# EAGLE board MeadowF7MicroDebug_REVA (EAGLE 9.2.1), part 1 of 2
uMeadow eval Kit.
DATE: 09/16/2018; ENGINEER: S.JOHNSON; PART_NUMBER: uMeadow; REV: A
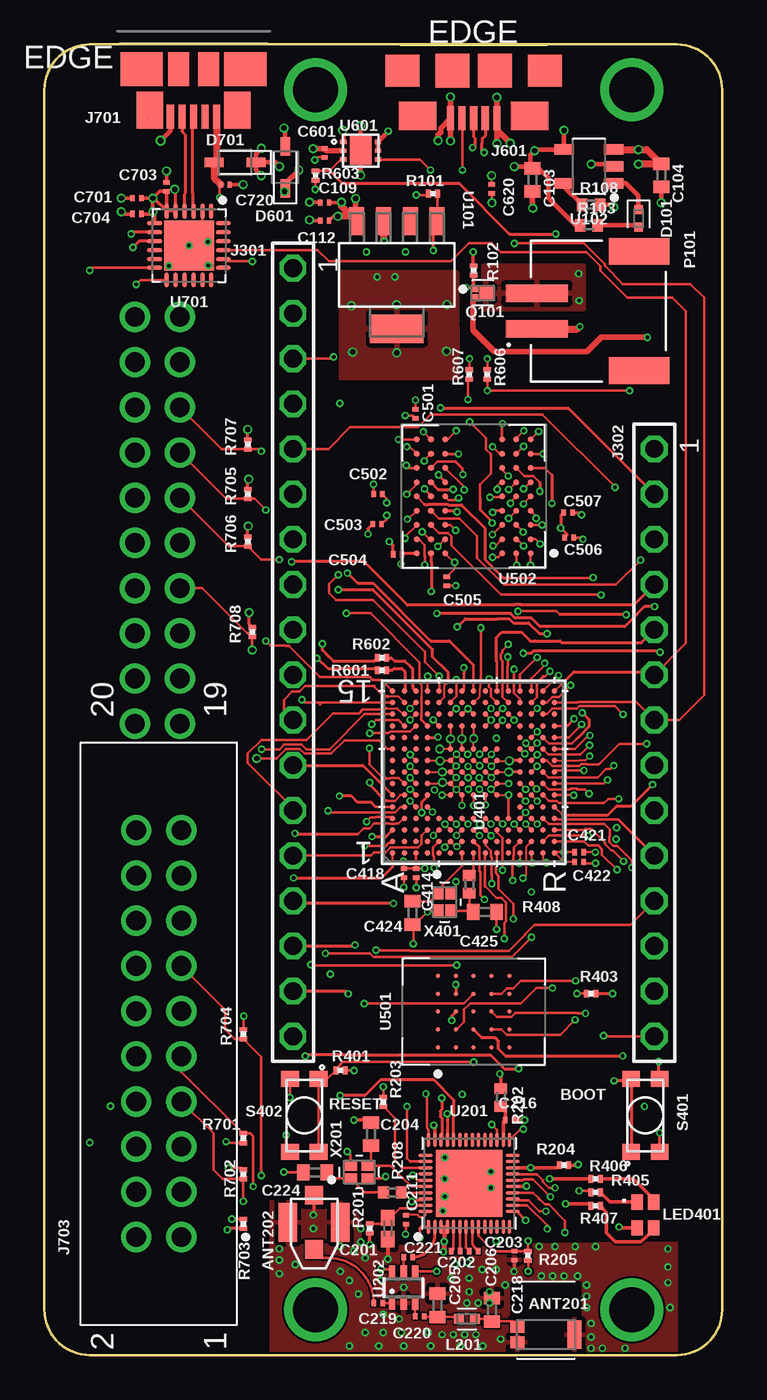
[diagram p0: board, top side]
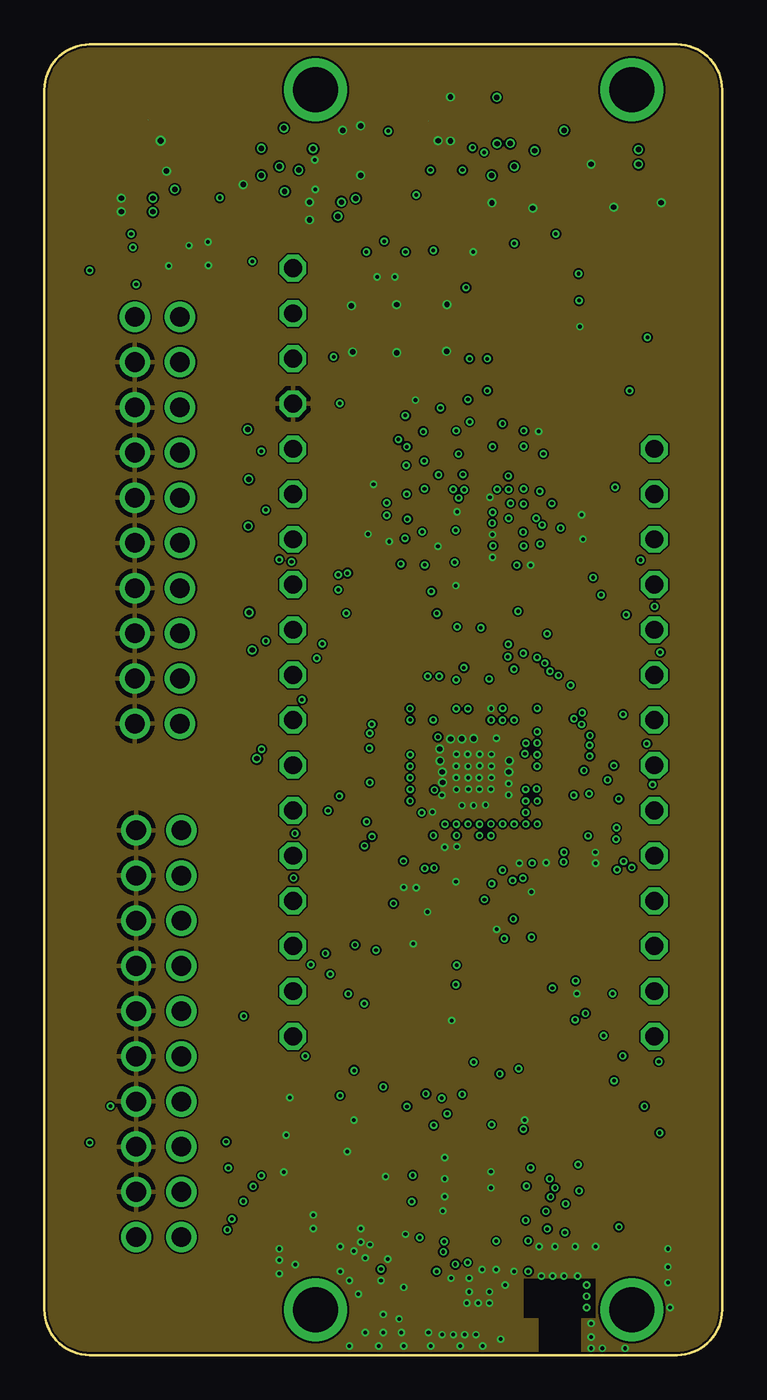
[diagram p1: board, inner layer Route2]
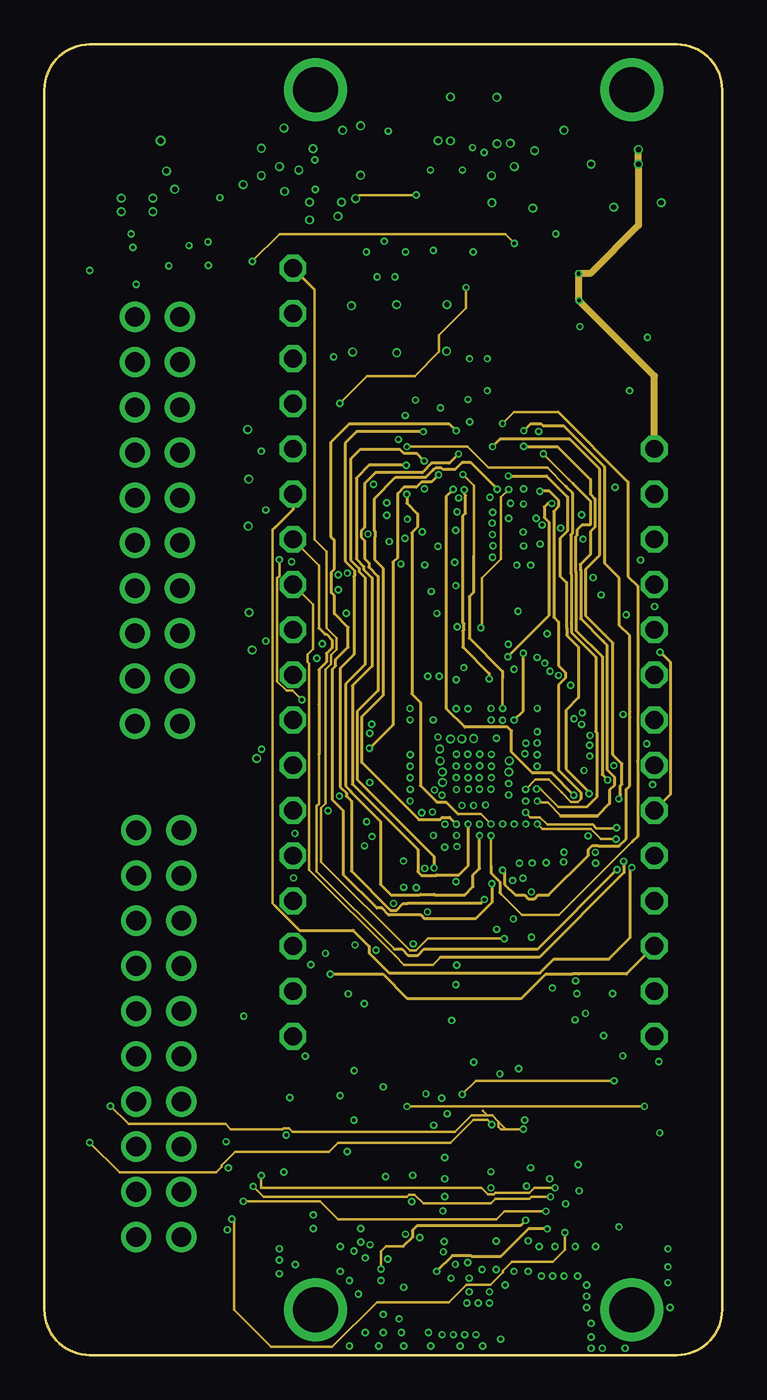
[diagram p2: board, inner layer Route3]
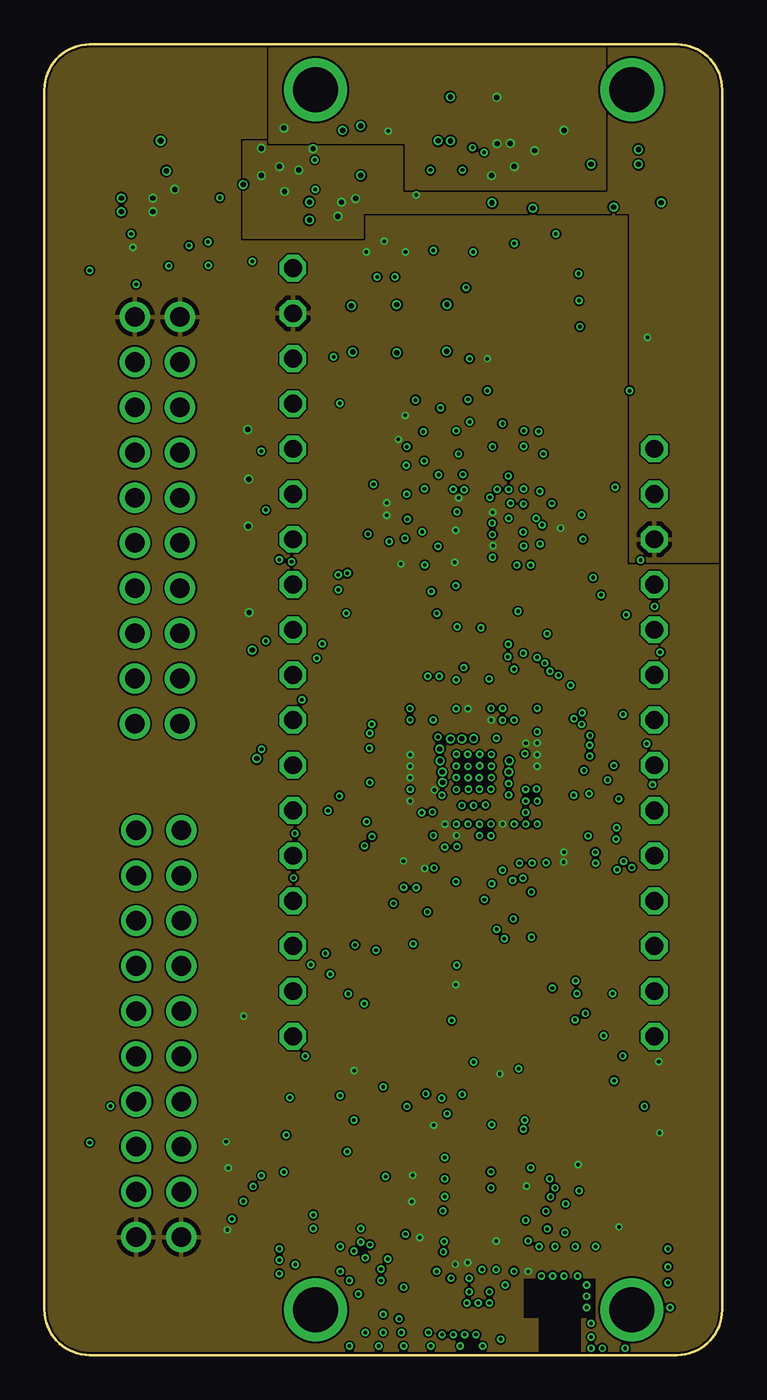
[diagram p3: board, inner layer Route14]
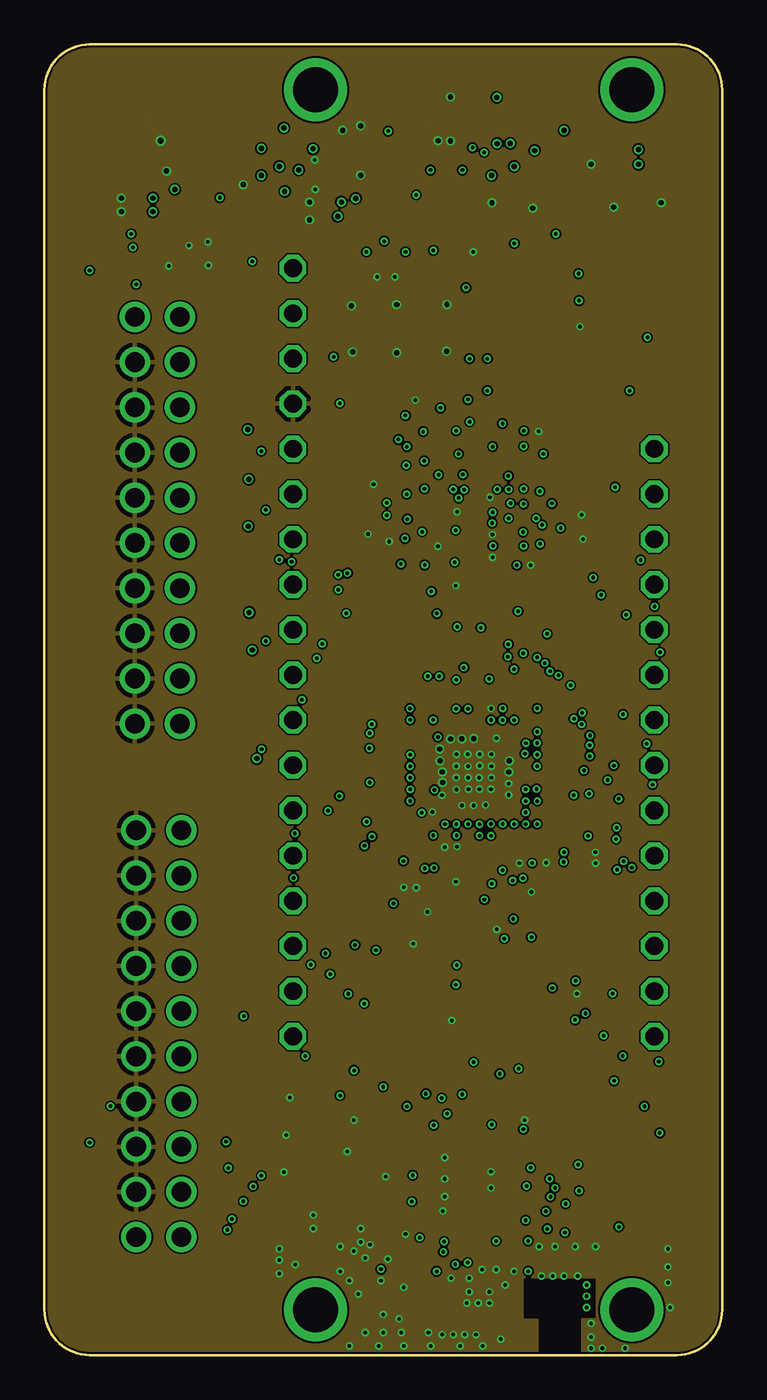
[diagram p4: board, inner layer Route15]
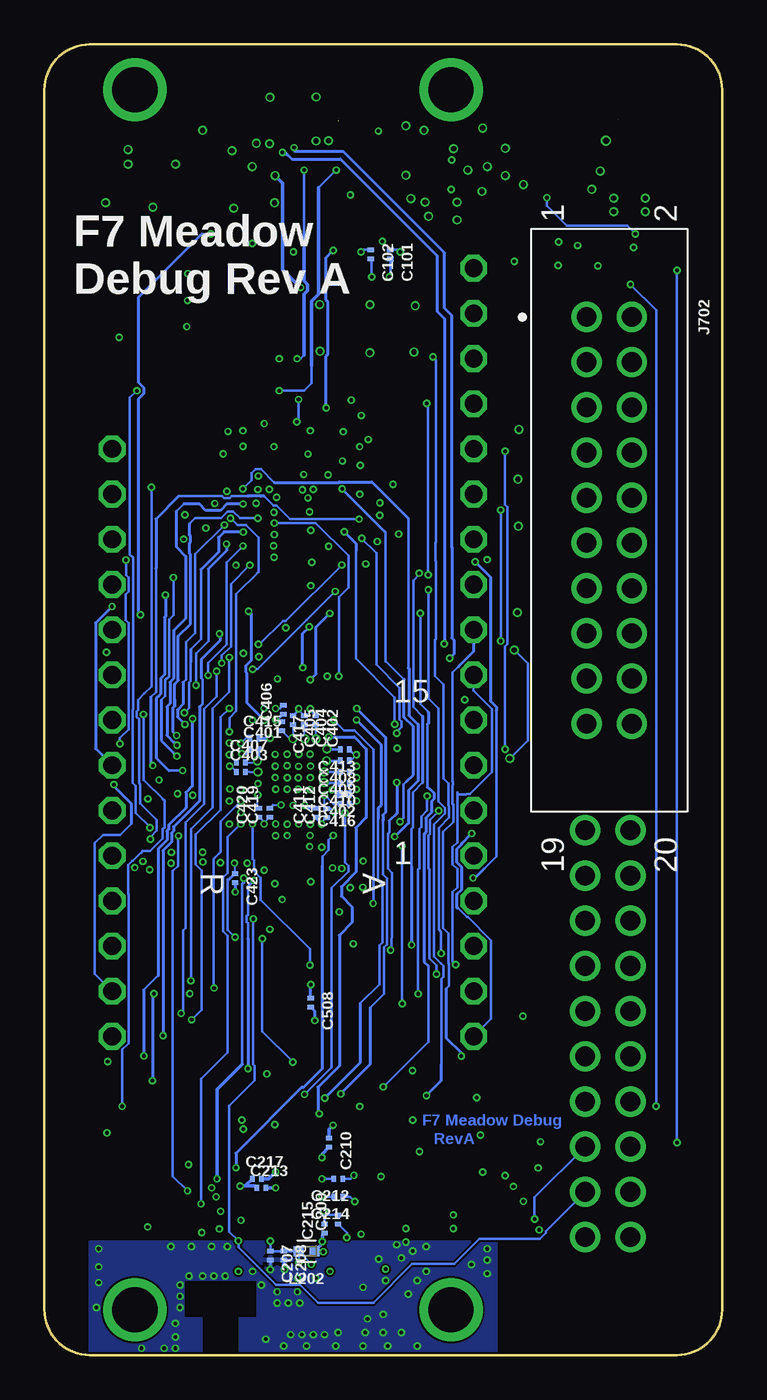
[diagram p5: board, bottom side, seen from below]

Size 38.1 x 73.66 mm. Coordinates in mm from the lower left corner, seen from the top.
Outline: 0,71.12 0,2.54 arc90 2.54,0 35.56,0 arc90 38.1,2.54 38.1,71.12 arc90 35.56,73.66 2.54,73.66 arc90 0,71.12
Copper layers (1*2+3*14+15*16): Top 0.035mm / dielectric 0.15mm / Route2 0.035mm / dielectric 0.15mm / Route3 0.035mm / dielectric 0.3mm / Route14 0.035mm / dielectric 0.15mm / Route15 0.035mm / dielectric 0.15mm / Bottom 0.035mm
Design rules "default *": minimum track width 0.1mm, minimum drill 0.15mm, track to track 0.1mm, track to pad 0.1mm, pad to pad 4mil, via to via 4mil, smd to smd 0mil, copper to edge 0.1mm, drill to drill 6mil, minimum pad ring 0.1mm, minimum via ring 4mil, stop-mask expansion 1mil, vias tented up to drill 20mil, thermal gap 10mil
Net classes: 1 USB: width 0.165 mm, drill 0.102 mm, clearance 0.254 mm; 2 MEM_ADDR_CNT: width 0.102 mm, drill 0.102 mm; 3 MEM_DATA: width 0.102 mm; 4 5V: width 0.1 mm; 5 50ohm: width 0.1 mm; 6 POWER: width 0.1 mm, drill 0.203 mm; 7 CLK: width 0.1 mm, drill 0.203 mm; 8 ANT: clearance 0.3 mm

## Footprints (pad centres in the part's own frame; a part is rotated, then mirrored left to right if it is on the bottom)
W3008 = smd 0.8 x 0.65: 1 1.6,-0.425; 2 1.6,0.425 | smd 0.8 x 1.6: 3 -1.6,0
A-1JB = smd 2.2 x 1.05: GND 0,1.475; GND2 0,-1.475 | smd 1.05 x 1: GND1 -1.525,0; SIG 1.525,0
C0201 = smd 0.25 x 0.35: 1 -0.25,0; 2 0.25,0
C0402 = smd 0.7 x 0.9: 1 -0.65,0; 2 0.65,0
C0402K = smd 0.925 x 0.74: 1 -0.6,0; 2 0.6,0
LEDC1005X50 = smd 0.5 x 0.5: 1 -0.5,0; 2 0.5,0
SOD2512X117 = smd 1.054 x 0.53: 1 -1.181,0; 2 1.181,0
TSW-118-XX-G-S = drill 1 pad 1.5 octagon: 1 21.59,0; 2 19.05,0; 3 16.51,0; 4 13.97,0; 5 11.43,0; 6 8.89,0; 7 6.35,0; 8 3.81,0; 9 1.27,0; 10 -1.27,0; 11 -3.81,0; 12 -6.35,0; 13 -8.89,0; 14 -11.43,0; 15 -13.97,0; 16 -16.51,0; 17 -19.05,0; 18 -21.59,0
TSW-114-XX-G-S = drill 1 pad 1.5 octagon: 1 16.51,0; 2 13.97,0; 3 11.43,0; 4 8.89,0; 5 6.35,0; 6 3.81,0; 7 1.27,0; 8 -1.27,0; 9 -3.81,0; 10 -6.35,0; 11 -8.89,0; 12 -11.43,0; 13 -13.97,0; 14 -16.51,0
USB_OTG = smd 0.4 x 1.35: 1 -1.3,2.675; 2 -0.65,2.675; 3 0,2.675; 4 0.65,2.675; 5 1.3,2.675 | smd 2.1 x 1.6: SHD1 3.15,2.55; SHD2 -3.15,2.55 | smd 1.9 x 1.9: SHD3 1.2,0; SHD4 -1.2,0 | smd 1.9 x 1.8: SHD5 -4,0; SHD6 4,0
USB_473461001 = smd 0.4 x 1.35: 1 -1.3,2.675; 2 -0.65,2.675; 3 0,2.675; 4 0.65,2.675; 5 1.3,2.675 | smd 1.5 x 2.1: SHD1 2.462,2.3; SHD2 -2.462,2.3 | smd 1.175 x 1.9: SHD3 0.838,0; SHD4 -0.838,0 | smd 2.375 x 1.9: SHD5 -2.913,0; SHD6 2.913,0
HDRV20W64P254_2X10_3276X876X838B = drill 1.105 pad 1.705: 1 0,0; 2 0,2.54; 3 2.54,0; 4 2.54,2.54; 5 5.08,0; 6 5.08,2.54; 7 7.62,0; 8 7.62,2.54; 9 10.16,0; 10 10.16,2.54; 11 12.7,0; 12 12.7,2.54; 13 15.24,0; 14 15.24,2.54; 15 17.78,0; 16 17.78,2.54; 17 20.32,0; 18 20.32,2.54; 19 22.86,0; 20 22.86,2.54
L0402 = smd 0.556 x 0.559: 1 -0.452,0; 2 0.452,0
LTST-C19HE1WT = smd 0.65 x 0.85: 1 -0.475,0.725; 2 0.475,0.725; 3 0.475,-0.725; 4 -0.475,-0.725
MTH_100_140MIL = drill 2.54 pad 3.556: P$1 0,0
JST_S2B-PH-SM4-TB(LF)(SN) = smd 1 x 3.5: 1 1,0; 2 -1,0 | smd 1.5 x 3.4: P1 3.35,5.75; P2 -3.35,5.75
DFN120X80X50-3 = smd 0.36 x 0.35: 1 -0.42,0.225; 2 -0.42,-0.225 | smd 0.76 x 0.772: 3 0.195,0
R0201 = smd 0.28 x 0.43: 1 -0.255,0; 2 0.255,0
R0402 = smd 0.6 x 0.7: 1 -0.5,0; 2 0.5,0
KMR211NG = smd 0.9 x 1: 1 -2.05,0.8; 2 2.05,0.8; 3 2.05,-0.8; 4 -2.05,-0.8
SOT150P696X180-5N = smd 1.6 x 0.838: 1 -3.023,2.261; 2 -3.023,0.762; 3 -3.023,-0.762; 4 -3.023,-2.261 | smd 1.6 x 2.997: 5 3.023,0
SOT95P270X145-5 = smd 1.1 x 0.6: 1 -1.4,0.95; 2 -1.4,0; 3 -1.4,-0.95; 4 1.4,-0.95; 5 1.4,0.95
QFN35P500X500X90-49N = smd 0.81 x 0.2: 1 -2.445,2.275; 2 -2.445,1.925; 3 -2.445,1.575; 4 -2.445,1.225; 5 -2.445,0.875; 6 -2.445,0.525; 7 -2.445,0.175; 8 -2.445,-0.175; 9 -2.445,-0.525; 10 -2.445,-0.875; 11 -2.445,-1.225; 12 -2.445,-1.575; 13 -2.445,-1.925; 14 -2.445,-2.275; 25 2.445,-2.275; 26 2.445,-1.925; 27 2.445,-1.575; 28 2.445,-1.225; 29 2.445,-0.875; 30 2.445,-0.525; 31 2.445,-0.175; 32 2.445,0.175; 33 2.445,0.525; 34 2.445,0.875; 35 2.445,1.225; 36 2.445,1.575; 37 2.445,1.925; 38 2.445,2.275 | smd 0.2 x 0.81: 15 -1.575,-2.445; 16 -1.225,-2.445; 17 -0.875,-2.445; 18 -0.525,-2.445; 19 -0.175,-2.445; 20 0.175,-2.445; 21 0.525,-2.445; 22 0.875,-2.445; 23 1.225,-2.445; 24 1.575,-2.445; 39 1.575,2.445; 40 1.225,2.445; 41 0.875,2.445; 42 0.525,2.445; 43 0.175,2.445; 44 -0.175,2.445; 45 -0.525,2.445; 46 -0.875,2.445; 47 -1.225,2.445; 48 -1.575,2.445 | smd 3.75 x 3.75: 49 0,0
SC70-6L = smd 0.35 x 0.8: 1 -0.65,-0.85; 2 0,-0.85; 3 0.65,-0.85; 4 0.65,0.85; 5 0,0.85; 6 -0.65,0.85
UFBGA-176 = smd 0.3 x 0.3: A1 -4.55,4.55; A2 -3.9,4.55; A3 -3.25,4.55; A4 -2.6,4.55; A5 -1.95,4.55; A6 -1.3,4.55; A7 -0.65,4.55; A8 0,4.55; A9 0.65,4.55; A10 1.3,4.55; A11 1.95,4.55; A12 2.6,4.55; A13 3.25,4.55; A14 3.9,4.55; A15 4.55,4.55; B1 -4.55,3.9; B2 -3.9,3.9; B3 -3.25,3.9; B4 -2.6,3.9; B5 -1.95,3.9; B6 -1.3,3.9; B7 -0.65,3.9; B8 0,3.9; B9 0.65,3.9; B10 1.3,3.9; B11 1.95,3.9; B12 2.6,3.9; B13 3.25,3.9; B14 3.9,3.9; B15 4.55,3.9; C1 -4.55,3.25; C2 -3.9,3.25; C3 -3.25,3.25; C4 -2.6,3.25; C5 -1.95,3.25; C6 -1.3,3.25; C7 -0.65,3.25; C8 0,3.25; C9 0.65,3.25; C10 1.3,3.25; C11 1.95,3.25; C12 2.6,3.25; C13 3.25,3.25; C14 3.9,3.25; C15 4.55,3.25; D1 -4.55,2.6; D2 -3.9,2.6; D3 -3.25,2.6; D4 -2.6,2.6; D5 -1.95,2.6; D6 -1.3,2.6; D7 -0.65,2.6; D8 0,2.6; D9 0.65,2.6; D10 1.3,2.6; D11 1.95,2.6; D12 2.6,2.6; D13 3.25,2.6; D14 3.9,2.6; D15 4.55,2.6; E1 -4.55,1.95; E2 -3.9,1.95; E3 -3.25,1.95; E4 -2.6,1.95; E12 2.6,1.95; E13 3.25,1.95; E14 3.9,1.95; E15 4.55,1.95; F1 -4.55,1.3; F2 -3.9,1.3; F3 -3.25,1.3; F4 -2.6,1.3; F6 -1.3,1.3; F7 -0.65,1.3; F8 0,1.3; F9 0.65,1.3; F10 1.3,1.3; F12 2.6,1.3; F13 3.25,1.3; F14 3.9,1.3; F15 4.55,1.3; G1 -4.55,0.65; G2 -3.9,0.65; G3 -3.25,0.65; G4 -2.6,0.65; G6 -1.3,0.65; G7 -0.65,0.65; G8 0,0.65; G9 0.65,0.65; G10 1.3,0.65; G12 2.6,0.65; G13 3.25,0.65; G14 3.9,0.65; G15 4.55,0.65; H1 -4.55,0; H2 -3.9,0; H3 -3.25,0; H4 -2.6,0; H6 -1.3,0; H7 -0.65,0; H8 0,0; H9 0.65,0; H10 1.3,0; H12 2.6,0; H13 3.25,0; H14 3.9,0; H15 4.55,0; J1 -4.55,-0.65; J2 -3.9,-0.65; J3 -3.25,-0.65; J4 -2.6,-0.65; J6 -1.3,-0.65; J7 -0.65,-0.65; J8 0,-0.65; J9 0.65,-0.65; J10 1.3,-0.65; J12 2.6,-0.65; J13 3.25,-0.65; J14 3.9,-0.65; J15 4.55,-0.65; K1 -4.55,-1.3; K2 -3.9,-1.3; K3 -3.25,-1.3; K4 -2.6,-1.3; K6 -1.3,-1.3; K7 -0.65,-1.3; K8 0,-1.3; K9 0.65,-1.3; K10 1.3,-1.3; K12 2.6,-1.3; K13 3.25,-1.3; K14 3.9,-1.3; K15 4.55,-1.3; L1 -4.55,-1.95; L2 -3.9,-1.95; L3 -3.25,-1.95; L4 -2.6,-1.95; L12 2.6,-1.95; L13 3.25,-1.95; L14 3.9,-1.95; L15 4.55,-1.95; M1 -4.55,-2.6; M2 -3.9,-2.6; M3 -3.25,-2.6; M4 -2.6,-2.6; M5 -1.95,-2.6; M6 -1.3,-2.6; M7 -0.65,-2.6; M8 0,-2.6; M9 0.65,-2.6; M10 1.3,-2.6; M11 1.95,-2.6; M12 2.6,-2.6; M13 3.25,-2.6; M14 3.9,-2.6; M15 4.55,-2.6; N1 -4.55,-3.25; N2 -3.9,-3.25; N3 -3.25,-3.25; N4 -2.6,-3.25; N5 -1.95,-3.25; N6 -1.3,-3.25; N7 -0.65,-3.25; N8 0,-3.25; N9 0.65,-3.25; N10 1.3,-3.25; N11 1.95,-3.25; N12 2.6,-3.25; N13 3.25,-3.25; N14 3.9,-3.25; N15 4.55,-3.25; P1 -4.55,-3.9; P2 -3.9,-3.9; P3 -3.25,-3.9; P4 -2.6,-3.9; P5 -1.95,-3.9; P6 -1.3,-3.9; P7 -0.65,-3.9; P8 0,-3.9; P9 0.65,-3.9; P10 1.3,-3.9; P11 1.95,-3.9; P12 2.6,-3.9; P13 3.25,-3.9; P14 3.9,-3.9; P15 4.55,-3.9; R1 -4.55,-4.55; R2 -3.9,-4.55; R3 -3.25,-4.55; R4 -2.6,-4.55; R5 -1.95,-4.55; R6 -1.3,-4.55; R7 -0.65,-4.55; R8 0,-4.55; R9 0.65,-4.55; R10 1.3,-4.55; R11 1.95,-4.55; R12 2.6,-4.55; R13 3.25,-4.55; R14 3.9,-4.55; R15 4.55,-4.55
BGA25C100P5X5_800X600X120 = smd 0.25 x 0.25: A1 -2,2; A2 -1,2; A3 0,2; A4 1,2; A5 2,2; B1 -2,1; B2 -1,1; B3 0,1; B4 1,1; B5 2,1; C1 -2,0; C2 -1,0; C3 0,0; C4 1,0; C5 2,0; D1 -2,-1; D2 -1,-1; D3 0,-1; D4 1,-1; D5 2,-1; E1 -2,-2; E2 -1,-2; E3 0,-2; E4 1,-2; E5 2,-2
BGA81C80P9X9_800X800X120 = smd 0.35 x 0.35: A1 -3.2,3.2; A2 -2.4,3.2; A3 -1.6,3.2; A7 1.6,3.2; A8 2.4,3.2; A9 3.2,3.2; B1 -3.2,2.4; B2 -2.4,2.4; B3 -1.6,2.4; B7 1.6,2.4; B8 2.4,2.4; B9 3.2,2.4; C1 -3.2,1.6; C2 -2.4,1.6; C3 -1.6,1.6; C7 1.6,1.6; C8 2.4,1.6; C9 3.2,1.6; D1 -3.2,0.8; D2 -2.4,0.8; D3 -1.6,0.8; D7 1.6,0.8; D8 2.4,0.8; D9 3.2,0.8; E1 -3.2,0; E2 -2.4,0; E3 -1.6,0; E7 1.6,0; E8 2.4,0; E9 3.2,0; F1 -3.2,-0.8; F2 -2.4,-0.8; F3 -1.6,-0.8; F7 1.6,-0.8; F8 2.4,-0.8; F9 3.2,-0.8; G1 -3.2,-1.6; G2 -2.4,-1.6; G3 -1.6,-1.6; G7 1.6,-1.6; G8 2.4,-1.6; G9 3.2,-1.6; H1 -3.2,-2.4; H2 -2.4,-2.4; H3 -1.6,-2.4; H7 1.6,-2.4; H8 2.4,-2.4; H9 3.2,-2.4; J1 -3.2,-3.2; J2 -2.4,-3.2; J3 -1.6,-3.2; J7 1.6,-3.2; J8 2.4,-3.2; J9 3.2,-3.2
U-DFN2018-6 = smd 0.35 x 0.25: 1 -0.975,0.5; 2 -0.975,0; 3 -0.975,-0.5; 4 0.975,-0.5; 5 0.975,0; 6 0.975,0.5 | smd 1.2 x 1.6: TAB 0,0
QFN50P400X400X80-25T280 = smd 0.86 x 0.264: 1 -1.935,1.25; 2 -1.935,0.75; 3 -1.935,0.25; 4 -1.935,-0.25; 5 -1.935,-0.75; 6 -1.935,-1.25; 13 1.935,-1.25; 14 1.935,-0.75; 15 1.935,-0.25; 16 1.935,0.25; 17 1.935,0.75; 18 1.935,1.25 | smd 0.264 x 0.86: 7 -1.25,-1.935; 8 -0.75,-1.935; 9 -0.25,-1.935; 10 0.25,-1.935; 11 0.75,-1.935; 12 1.25,-1.935; 19 1.25,1.935; 20 0.75,1.935; 21 0.25,1.935; 22 -0.25,1.935; 23 -0.75,1.935; 24 -1.25,1.935 | smd 2.8 x 2.8: 25 0,0
OSCCC160X120X40 = smd 0.73 x 0.58: 1 -0.5,-0.35; 2 0.5,-0.35; 3 0.5,0.35; 4 -0.5,0.35

## Placement (x,y rotation side)
ANT201  w3008  [W3008]  28.19,1.14 180 top
ANT202  A-1JB  [A-1JB]  15.16,7.47 270 top
C101  0.1uF  [C0201]  18.66,61.87 270 bottom
C102  1uF  [C0201]  19.75,61.87 270 bottom
C103  4.7uF  [C0402]  27.43,66.04 270 top
C104  4.7uF  [C0402]  34.67,66.29 270 top
C109  0.1uF  [C0201]  15.75,64.77 180 top
C112  1uF  [C0201]  15.75,63.75 180 top
C201  3nF  [C0402K]  19.3,7.11 90 top
C202  0.1uF  [C0201]  23.11,5.84 0 top
C203  0.1uF  [C0201]  24.13,5.84 0 top
C204  8pF  [C0402]  18.35,12.43 90 top
C205  6pF  [C0402]  22.1,2.79 90 top
C206  6.2pF  [C0402]  25.15,2.54 90 top
C207  0.1uF  [C0201]  25.4,5.59 270 bottom
C208  1uF  [C0201]  24.64,5.59 270 bottom
C209  0.1uF  [C0201]  21.59,7.62 90 bottom
C210  1uF  [C0201]  22.1,11.94 270 bottom
C211  10nF  [C0201]  20.32,7.62 90 top
C212  1uF  [C0201]  21.59,9.91 180 bottom
C213  0.1uF  [C0201]  25.91,9.4 0 bottom
C214  0.1uF  [C0201]  21.59,8.89 180 bottom
C215  0.1uF  [C0201]  22.35,7.11 90 bottom
C216  0.1uF  [C0201]  26.16,13.21 0 top
C217  100pF  [C0201]  26.16,9.91 0 bottom
C218  0.1uF  [C0201]  26.42,5.59 270 top
C219  100pF  [C0201]  18.77,2.92 0 top
C220  100pF  [C0201]  21.11,2.18 180 top
C221  100pF  [C0201]  20.45,5.51 0 top
C224  8pF  [C0402]  15.21,10.28 180 top
C401  2.2uF  [C0201]  26.29,34.04 0 bottom
C402  2.2uF  [C0201]  22.86,35.69 270 bottom
C403  0.1uF  [C0201]  27.05,32.77 0 bottom
C404  1uF  [C0201]  23.49,35.69 270 bottom
C405  0.1uF  [C0201]  24.12,35.68 270 bottom
C406  0.1uF  [C0201]  24.67,36.27 90 bottom
C407  0.1uF  [C0201]  27.05,33.31 0 bottom
C408  0.1uF  [C0201]  21.21,33.4 180 bottom
C409  0.1uF  [C0201]  21.21,32.77 180 bottom
C410  0.1uF  [C0201]  21.21,32.13 180 bottom
C411  0.1uF  [C0201]  22.83,30.49 90 bottom
C412  0.1uF  [C0201]  22.23,30.46 90 bottom
C413  0.1uF  [C0201]  21.21,34.04 180 bottom
C414  0.1uF  [C0201]  20.9,27.09 270 top
C415  0.1uF  [C0201]  26.29,34.67 0 bottom
C416  0.1uF  [C0201]  21.22,30.97 180 bottom
C417  0.1uF  [C0201]  24.76,35.34 270 bottom
C418  0.1uF  [C0201]  20.21,27.09 270 top
C419  1uF  [C0201]  25.43,30.49 90 bottom
C420  0.1uF  [C0201]  26.04,30.48 90 bottom
C421  0.1uF  [C0201]  30.05,28.26 0 top
C422  1uF  [C0201]  30.05,27.72 0 top
C423  0.1uF  [C0201]  27.38,26.79 270 bottom
C424  8pF  [C0402]  20.7,24.85 270 top
C425  8pF  [C0402]  24.77,24.89 0 top
C501  0.1uF  [C0201]  20.86,52.91 90 top
C502  0.1uF  [C0201]  18.75,48.39 180 top
C503  0.1uF  [C0201]  18.7,46.7 180 top
C504  1uF  [C0201]  19.85,45 180 top
C505  0.1uF  [C0201]  22.62,43.49 270 top
C506  1uF  [C0201]  29.49,45.94 0 top
C507  0.1uF  [C0201]  29.44,47.35 0 top
C508  0.1uF  [C0201]  23.13,19.8 270 bottom
C601  0.1uF  [C0201]  15.75,67.56 270 top
C620  4.7uF  [C0201]  25.15,65.53 270 top
C701  0.1uF  [C0201]  5.21,65.02 180 top
C703  0.1uF  [C0201]  6.86,65.66 90 top
C704  1uF  [C0201]  5.21,64.14 180 top
C720  4.7uF  [C0201]  10.16,65.79 0 top
D101  QBLP595-O  [LEDC1005X50]  33.4,63.88 270 top
D601  BAT60JFILM  [SOD2512X117]  13.53,66.75 90 top
D701  BAT60JFILM  [SOD2512X117]  10.72,67.03 180 top
DRILEGEND  [DRILEGEND]  -105.34,-61.67 0 top  (outside the outline)
J301  TSW-118-07-G-S  [TSW-118-XX-G-S]  13.97,39.5 90 top
J302  TSW-114-07-G-S  [TSW-114-XX-G-S]  34.29,34.42 90 top
J601  USB_OTG_ZX62-AB-5PA  [USB_OTG]  24.13,72.19 180 top
J701  uUSB-B  [USB_473461001]  8.38,72.26 180 top
J702  02X20  [HDRV20W64P254_2X10_3276X876X838B]  7.62,58.34 270 bottom
J703  02X20  [HDRV20W64P254_2X10_3276X876X838B]  7.7,6.63 90 top
L201  1.5nH  [L0402]  23.75,2.03 180 top
L202  2nh  [L0402]  23.37,5.84 180 bottom
LED401  LTST-C19HE1WT  [LTST-C19HE1WT]  33.78,7.87 0 top
MTH1  100MIL_140MIL  [MTH_100_140MIL]  15.24,2.54 0 top
MTH2  100MIL_140MIL  [MTH_100_140MIL]  33.02,2.54 0 top
MTH3  100MIL_140MIL  [MTH_100_140MIL]  15.24,71.12 0 top
MTH4  100MIL_140MIL  [MTH_100_140MIL]  33.02,71.12 0 top
P101  S2B-PH-SM4-TB(LF)(SN)  [JST_S2B-PH-SM4-TB(LF)(SN)]  27.69,58.67 270 top
Q101  SSM3J46CTB  [DFN120X80X50-3]  24.64,59.69 0 top
R101  10K  [R0201]  21.84,65.28 180 top
R102  10K  [R0201]  24.13,60.96 270 top
R103  470  [R0402]  30.61,63.5 0 top
R108  4.7K  [R0402]  30.73,64.64 0 top
R201  20K  [R0201]  18.29,7.11 270 top
R202  00  [R0402]  25.65,14.48 270 top
R203  499  [R0201]  19.05,14.22 90 top
R204  20K  [R0201]  29.21,10.67 180 top
R205  10K  [R0201]  27.18,5.59 270 top
R208  00  [R0402]  19.56,9.14 180 top
R401  10K  [R0201]  16.64,16 0 top
R402  10K  [R0201]  21.22,31.52 180 bottom
R403  10K  [R0201]  30.73,20.32 0 top
R405  620  [R0201]  30.99,9.14 0 top
R406  300  [R0201]  30.99,9.91 0 top
R407  300  [R0201]  30.99,8.38 0 top
R408  00  [R0402]  23.88,26.45 90 top
R601  0R  [R0201]  18.98,38.49 180 top
R602  0R  [R0201]  18.97,39.18 180 top
R603  10K  [R0201]  15.24,66.29 90 top
R606  47K  [R0201]  24.89,55.12 90 top
R607  0R  [R0201]  23.88,55.12 90 top
R701  10K  [R0201]  11.18,12.19 270 top
R702  10K  [R0201]  11.18,10.16 90 top
R703  10K  [R0201]  11.18,7.37 270 top
R704  10K  [R0201]  11.18,18.03 90 top
R705  10K  [R0201]  11.43,48.39 90 top
R706  10K  [R0201]  11.43,45.72 90 top
R707  10K  [R0201]  11.43,51.18 90 top
R708  10K  [R0201]  11.68,40.64 90 top
S401  SPST_SW_KMR211NG_LFS  [KMR211NG]  33.78,13.46 90 top
S402  SPST_SW_KMR211NG_LFS  [KMR211NG]  14.6,13.46 270 top
U101  LP38693MP-3.3  [SOT150P696X180-5N]  19.81,60.71 270 top
U102  MCP7381-2-0T  [SOT95P270X145-5]  30.61,66.8 180 top
U201  ESP32-D2WD  [QFN35P500X500X90-49N]  23.88,9.65 90 top
U202  SKYA21001  [SC70-6L]  20.19,3.78 0 top
U401  STM32F777  [UFBGA-176]  24.13,32.77 90 top
U501  32MB  [BGA25C100P5X5_800X600X120]  24.13,19.3 90 top
U502  32MB  [BGA81C80P9X9_800X800X120]  24.13,48.26 180 top
U601  AP2151  [U-DFN2018-6]  17.78,67.69 0 top
U701  CP2105  [QFN50P400X400X80-25T280]  8.13,62.36 270 top
X201  ABM12W-40  [OSCCC160X120X40]  17.7,10.28 0 top
X401  ABM12W-25  [OSCCC160X120X40]  22.5,25.46 270 top

## Library data of the parts
ANT201 = SLJ_wireless; MANUFACTURER: PulseLarsen; PART_NUMBER: W3008
ANT202 = SLJ_wireless; MANUFACTURER: amphenol RF; PART_NUMBER: A-1JB
C101 = eagle-ltspice; FOOTPRINT: 0201; MANUFACTURER: Murata Electronica; PART_NUMBER: GRM033C71A104KE14D; SPICEMODEL: NONE; SPICEPREFIX: C; VOLTAGE: 10V
C102 C112 C208 C210 C212 C404 C419 C422 C504 C506 C704 = eagle-ltspice; FOOTPRINT: 0201; MANUFACTURER: Murata Electronica; PART_NUMBER: GRT033R60J105ME13D; SPICEMODEL: NONE; SPICEPREFIX: C; VOLTAGE: 6.3V
C103 C104 = rcl; MANUFACTURER: MURATA; PACKAGE: 0402; PART_NUMBER: GRM155R60J475ME87D; SPICEPREFIX: C
C109 C207 C209 C213-C216 C218 C403 C405-C418 C420 C421 C423 C501-C503 C505 C507 C508 C601 C701 C703 = eagle-ltspice; FOOTPRINT: 0201; MANUFACTURER: Murata Electronica; PART_NUMBER: GRM033R61A104ME15D; SPICEMODEL: NONE; SPICEPREFIX: C; VOLTAGE: 10V
C201 = rcl; FOOTPRINT: 0402; MANUFACTURER: MURATA; PART_NUMBER: GRM1557U1A302JA01D; SPICEPREFIX: C
C202 C203 = eagle-ltspice; DNI: DNI; FOOTPRINT: 0201; MANUFACTURER: Murata Electronica; PART_NUMBER: GRM033R61A104ME15D; SPICEMODEL: NONE; SPICEPREFIX: C; VOLTAGE: 10V
C204 C224 C424 C425 = eagle-ltspice; FOOTPRINT: 0402; MANUFACTURER: Murata Electronica; PART_NUMBER: GRM1555C1H8R0DA01D; SPICEMODEL: NONE; SPICEPREFIX: C; VOLTAGE: 50V
C205 = eagle-ltspice; FOOTPRINT: 0402; MANUFACTURER: Murata Electronica; PART_NUMBER: GJM1555C1H6R0BB01D; SPICEMODEL: NONE; SPICEPREFIX: C; VOLTAGE: 50V
C206 = eagle-ltspice; FOOTPRINT: 0402; MANUFACTURER: Murata Electronica; PART_NUMBER: GRM1555C1H6R2BA01D; SPICEMODEL: NONE; SPICEPREFIX: C; VOLTAGE: 50V
C211 = eagle-ltspice; FOOTPRINT: 0201; MANUFACTURER: TDK; PART_NUMBER: C0603X7R1A103K030BA; SPICEMODEL: NONE; SPICEPREFIX: C; VOLTAGE: 10V
C217 = eagle-ltspice; FOOTPRINT: 0201; MANUFACTURER: Murata Electronica; PART_NUMBER: GRM0335C1H101JA01D; SPICEMODEL: NONE; SPICEPREFIX: C; VOLTAGE: 50V
C219 C220 = eagle-ltspice; FOOTPRINT: 0201; MANUFACTURER: MURATA; PART_NUMBER: GRM0335C1H101JA01D; SPICEMODEL: NONE; SPICEPREFIX: C; VOLTAGE: 10V
C221 = eagle-ltspice; FOOTPRINT: 0201; MANUFACTURER: Murata; PART_NUMBER: GRM0335C1H101JA01D; SPICEMODEL: NONE; SPICEPREFIX: C; VOLTAGE: 10V
C401 C402 = eagle-ltspice; FOOTPRINT: 0201; MANUFACTURER: Murata Electronica; PART_NUMBER: GRM033R61A225KE47D; SPICEMODEL: NONE; SPICEPREFIX: C; VOLTAGE: 10V
C620 C720 = eagle-ltspice; FOOTPRINT: 0201; MANUFACTURER: Murata Electronica; PART_NUMBER: GRM035R60J475ME15D; SPICEMODEL: NONE; SPICEPREFIX: C; VOLTAGE: 6.3V
D101 = SLJ_Diodes; COLOR: ORANGE; MANUFACTURER: QT BRIGHTEK; PART_NUMBER: QBLP595-O
D601 D701 = SLJ_Diodes; MANUFACTURER: STMicroelectronics; PART_NUMBER: BAT60JFILM
DRILEGEND = drilegend
J301 = con-samtec; DNI: DNI; MANUFACTURER: Samtec; MF: Samtec Inc.; MPN: TSW-118-07-G-S; PART_NUMBER: TSW-118-07-G-S
J302 = con-samtec; DNI: DNI; MF: Samtec Inc.; MPN: TSW-114-07-G-S
J601 = SLJ_Connectors; MANUFACTURER: Hirose Electric Co.; PART_NUMBER: ZX62-AB-5PA(31)
J701 = SLJ_Connectors; MANUFACTURER: Molex; PART_NUMBER: 0473461001
J702 J703 = SLJ_Connectors; MANUFACTURER: AMPHENOL FCI; PART_NUMBER: 52601-S20-4LF
L201 = SLJ_passives; CURRENT: 300mA; FOOTPRINT: 0402; MANUFACTURER: Johanson Technology; PART_NUMBER: L-07C1N5SV6T
L202 = SLJ_passives; CURRENT: 900mA; FOOTPRINT: 0402; MANUFACTURER: Murata Electronics; PART_NUMBER: LQG15HS2N0S02D
LED401 = SLJ_Diodes; MANUFACTURER: LITE-ON; PART_NUMBER: LTST-C19HE1WT
MTH1-MTH4 = SLJ_MECH; DNI: DNI
P101 = SLJ_Connectors; DESCRIPTION: PH Series 2 Position 2 mm Pitch Surface Mount Side Entry Shrouded Header; MANUFACTURER: JST; PACKAGE: FakePackage u; PART_NUMBER: S2B-PH-SM4-TB_LF__SN_; PRICE: None
Q101 = SLJ_TRANSISTORS; CURRENT: 2A; MANUFACTURER: Toshiba Semiconductor; PART_NUMBER: SSM3J46CTB(TPL3); VOLTAGE: 20V
R101 = rcl; FOOTPRINT: 0201; MANUFACTURER: Panasonic; PART_NUMBER: RC0201FR-0710KL; SPICEPREFIX: R
R102 R205 R401-R403 R603 = rcl; FOOTPRINT: 0201; MANUFACTURER: Yageo; PART_NUMBER: RC0201FR-0710KL; SPICEPREFIX: R
R103 = rcl; FOOTPRINT: 0402; MANUFACTURER: Samsung; PART_NUMBER: RC1005J471CS; SPICEPREFIX: R
R108 = rcl; FOOTPRINT: 0402; MANUFACTURER: Panasonic; PART_NUMBER: ERA-2AEB472X; SPICEPREFIX: R
R201 R204 = rcl; FOOTPRINT: 0201; MANUFACTURER: YAGEO; PART_NUMBER: RC0201FR-0720KL; SPICEPREFIX: R
R202 R208 R408 = rcl; FOOTPRINT: 0402; MANUFACTURER: Panasonic; PART_NUMBER: ERJ-2GE0R00X; SPICEPREFIX: R
R203 = rcl; FOOTPRINT: 0201; MANUFACTURER: PANASONIC; PART_NUMBER: ERJ-1GNF4990C; SPICEPREFIX: R
R405 = rcl; FOOTPRINT: 0201; MANUFACTURER: Yageo; PART_NUMBER: RC0201JR-07620RL; SPICEPREFIX: R
R406 R407 = rcl; FOOTPRINT: 0201; MANUFACTURER: Yageo; PART_NUMBER: RC0201FR-07300RL; SPICEPREFIX: R
R601 R602 R607 = rcl; FOOTPRINT: 0201; MANUFACTURER: Panasonic; PART_NUMBER: ERJ-1GN0R00C; SPICEPREFIX: R
R606 = rcl; FOOTPRINT: 0201; MANUFACTURER: Samsung Electro-Mechanics; PART_NUMBER: RC0603F473CS; SPICEPREFIX: R
R701-R708 = rcl; FOOTPRINT: 0201; MANUFACTURER: Panasonic; PART_NUMBER: ERJ-1GEF1002C; SPICEPREFIX: R
S401 S402 = SLJ_SWITCHES; MANUFACTURER: C&K; PART_NUMBER: KMR211NG LFS
U101 = LP38693MP-3.3; DESCRIPTION: 500mA Low Dropout CMOS Linear Regulators Stable with Ceramic Output Capacitors 5-SOT-223 -40 to 125; MANUFACTURER: Texas Instruments; PACKAGE: SOT-223 Texas Instruments; PART_NUMBER: LP38693MP-3.3/NOPB; PRICE: None
U102 = SLJ_PMIC; MANUFACTURER: MicroChip; PART_NUMBER: MCP73831T-2ACI/OT
U201 = SLJ_wireless; MANUFACTURER: Espressif Systems; PART_NUMBER: ESP32-D2WD
U202 = SLJ_wireless; MANUFACTURER: Skyworks Solutions; PART_NUMBER: SKYA21001
U401 = STM32_MCU; MANUFACTURER: STMicroelectronics; PART_NUMBER: STM32F777IIK6
U501 = SLJ_Memory; MANUFACTURER: Cypress Semiconductor; PART_NUMBER: S25FL256LAGBHV030
U502 = SLJ_Memory; MANUFACTURER: ISSI; PART_NUMBER: IS42S16160J-7BLI; VOLTAGE: 3.3V
U601 = SLJ_PMIC; MANUFACTURER: Diodes Inc; PART_NUMBER: AP2151DFMG-7
U701 = SLJ_IC; MANUFACTURER: SILICON LABS; PART_NUMBER: CP2105-F01-GM
X201 = SLJ_OSC; MANUFACTURER: Abracon LLC; PART_NUMBER: ABM12W-40.0000MHZ-6-B1U-T3
X401 = SLJ_OSC; MANUFACTURER: Abracon LLC; PART_NUMBER: ABM12W-25.0000MHZ-6-B1U-T3

## Nets
+3V3 [POWER]: C101.1 C102.1 C207.1 C208.1 C209.1 C210.1 C212.1 C213.1 C214.1 C217.1 C403.1 C404.1 C405.1 C406.1 C407.1 C408.1 C409.1 C410.1 C411.1 C412.1 C413.1 C414.1 C415.1 C416.1 C417.1 C418.1 C419.1 C420.1 C421.1 C422.1 C501.1 C502.1 C503.1 C504.1 C505.1 C506.1 C507.1 C508.1 C701.1 C703.1 C704.1 J301.2 J702.1 J702.2 J703.1 J703.2 L202.2 LED401.4 R202.1 R204.1 R205.2 R401.2 R402.2 R606.2 R701.2 R702.2 R703.2 R704.2 R705.2 R706.2 R707.2 R708.2 S401.3 S401.4 U101.3 U201.1 U201.19 U201.37 U201.43 U201.46 U401.C1 U401.C5 U401.C7 U401.C8 U401.C9 U401.F3 U401.G3 U401.G13 U401.H13 U401.J12 U401.J13 U401.K4 U401.N8 U401.N9 U401.N10 U401.R1 U501.B4 U502.A7 U502.A9 U502.B3 U502.C7 U502.D3 U502.E7 U502.J9 U701.5 U701.6 U701.7 U701.9
+5V [5V]: C109.1 C112.1 C601.1 D601.1 D701.1 J302.3 Q101.2 R101.2 U101.4 U601.2
+VBAT [CLK]: C104.1 J302.1 P101.2 Q101.3 U102.3
+VBUS [POWER]: C103.1 C620.1 D601.2 J601.1 Q101.1 R102.2 R103.1 U102.4 U401.E15 U601.5 U601.6
+VREF [MEM_DATA]: C423.1 J301.3 U401.N1
ADC1_IN3 [MEM_DATA]: J301.7 U401.R2
ADC1_IN7 [MEM_DATA]: J301.8 U401.R3
ADC1_IN10 [MEM_DATA]: J301.9 U401.M2
ADC1_IN11 [MEM_DATA]: J301.10 U401.M3
CAN1_RX [MEM_DATA]: J301.17 U401.A5
CAN1_TX [MEM_DATA]: J301.18 U401.B4
DAC_OUT1 [MEM_DATA]: J301.5 U401.N4
DAC_OUT2 [MEM_DATA]: J301.6 U401.P4
DEBUG1:+VBUS_UART: C720.1 D701.2 J701.1 U701.8
DEBUG1:D_N [USB]: J701.4 U701.4
DEBUG1:D_P [USB]: J701.3 U701.3
DEBUG1:ID: J701.2
DEBUG1:RESET_L [MEM_DATA]: J702.3
EN_3V3: J302.2 R101.1 U101.1
ESP32:40MHZ_N: C204.1 U201.44 X201.3
ESP32:40MHZ_P: R208.1 U201.45
ESP32:CHIP_ANT_50OHM [ANT]: C205.1 C220.1 L201.2
ESP32:EXTANT_50OHM [ANT]: ANT202.SIG C219.1
ESP32:GPIO26: U201.15 U202.6
ESP32:GPIO27: U201.16 U202.4
ESP32:LNA_50OHM [ANT]: C221.2 U201.2
ESP32:N$1: C211.2 U201.48
ESP32:N$2: C201.2 R201.1 U201.47
ESP32:N$3: C203.2 U201.8
ESP32:N$4: C202.1 U201.5
ESP32:N$5: C202.2 U201.6
ESP32:N$6: C224.1 R208.2 X201.1
ESP32:N$7: C203.1 U201.7
ESP32:N$8 [ANT]: ANT201.1 C206.1 L201.1
ESP32:N$9 [MEM_DATA]: U201.10
ESP32:N$10: R203.1 U201.41
ESP32:N$11: C215.1 L202.1 U201.3 U201.4
ESP32:N$12 [MEM_DATA]: U201.11
ESP32:N$13: C220.2 U202.3
ESP32:N$14: C219.2 U202.1
ESP32:N$15: C221.1 U202.5
ESP32:N$17: C216.1 R202.2 U201.26
ESP32_BOOT_L: R204.2 U201.22 U401.E3
ESP32_MTCH: J703.9 R701.1 U201.20
ESP32_MTDI: J703.5 R703.1 U201.18
ESP32_MTDO: J703.13 R704.1 U201.21
ESP32_MTMS: J703.7 R702.1 U201.17
ESP32_RESET_L: C218.1 J703.3 R205.1 U201.9 U401.K1
ESP32_UART5: R203.2 U401.D12
FLASH_CLK [CLK]: U401.M6 U501.B2
FLASH_CS_L [CLK]: U401.R12 U501.C2
FMC_A0 [MEM_ADDR_CNT]: U401.E2 U502.H7
FMC_A1 [MEM_ADDR_CNT]: U401.H3 U502.H8
FMC_A2 [MEM_ADDR_CNT]: U401.H2 U502.J8
FMC_A3 [MEM_ADDR_CNT]: U401.J2 U502.J7
FMC_A4 [MEM_ADDR_CNT]: U401.J3 U502.J3
FMC_A5 [MEM_ADDR_CNT]: U401.K3 U502.J2
FMC_A6 [MEM_ADDR_CNT]: U401.P6 U502.H3
FMC_A7 [MEM_ADDR_CNT]: U401.N6 U502.H2
FMC_A8 [MEM_ADDR_CNT]: U401.R7 U502.H1
FMC_A9 [MEM_ADDR_CNT]: U401.P7 U502.G3
FMC_A10 [MEM_ADDR_CNT]: U401.N7 U502.H9
FMC_A11 [MEM_ADDR_CNT]: U401.M7 U502.G2
FMC_A12 [MEM_ADDR_CNT]: U401.L15 U502.G1
FMC_A13 [MEM_ADDR_CNT]: U502.E2
FMC_A14 [MEM_ADDR_CNT]: U401.K14 U502.G7
FMC_A15 [MEM_ADDR_CNT]: U401.K13 U502.G8
FMC_CAS_L [MEM_ADDR_CNT]: U401.B7 U502.F7
FMC_CKE_L [MEM_ADDR_CNT]: U401.F4 U502.F3
FMC_CLK [MEM_ADDR_CNT]: U401.H14 U502.F2
FMC_CS_L [MEM_ADDR_CNT]: U401.G4 U502.G9
FMC_D0 [MEM_DATA]: U401.M14 U502.A8
FMC_D1 [MEM_DATA]: U401.L14 U502.B9
FMC_D2 [MEM_DATA]: U401.B12 U502.B8
FMC_D3 [MEM_DATA]: U401.C12 U502.C9
FMC_D4 [MEM_DATA]: U401.R8 U502.C8
FMC_D5 [MEM_DATA]: U401.P8 U502.D9
FMC_D6 [MEM_DATA]: U401.P9 U502.D8
FMC_D7 [MEM_DATA]: U401.R9 U502.E9
FMC_D8 [MEM_DATA]: U401.P10 U502.E1
FMC_D9 [MEM_DATA]: U401.R10 U502.D2
FMC_D10 [MEM_DATA]: U401.N11 U502.D1
FMC_D11 [MEM_DATA]: U401.P11 U502.C2
FMC_D12 [MEM_DATA]: U401.R11 U502.C1
FMC_D13 [MEM_DATA]: U401.P15 U502.B2
FMC_D14 [MEM_DATA]: U401.P14 U502.B1
FMC_D15 [MEM_DATA]: U401.N15 U502.A2
FMC_DQMH [MEM_DATA]: U401.A3 U502.F1
FMC_DQML [MEM_DATA]: U401.A4 U502.E8
FMC_RAS_L [MEM_ADDR_CNT]: U401.R6 U502.F8
FMC_WE [MEM_ADDR_CNT]: U401.J4 U502.F9
GND [POWER]: ANT201.2 ANT201.3 ANT202.GND ANT202.GND1 ANT202.GND2 C101.2 C102.2 C103.2 C104.2 C109.2 C112.2 C201.1 C204.2 C205.2 C206.2 C207.2 C208.2 C209.2 C210.2 C211.1 C212.2 C213.2 C214.2 C215.2 C216.2 C217.2 C218.2 C224.2 C401.2 C402.2 C403.2 C404.2 C405.2 C406.2 C407.2 C408.2 C409.2 C410.2 C411.2 C412.2 C413.2 C414.2 C415.2 C416.2 C417.2 C418.2 C419.2 C420.2 C421.2 C422.2 C423.2 C424.2 C425.2 C501.2 C502.2 C503.2 C504.2 C505.2 C506.2 C507.2 C508.2 C601.2 C620.2 C701.2 C703.2 C704.2 C720.2 J301.4 J601.5 J701.5 J702.4 J702.6 J702.8 J702.10 J702.12 J702.14 J702.16 J702.18 J702.20 J703.4 J703.6 J703.8 J703.10 J703.12 J703.14 J703.16 J703.18 J703.20 P101.1 R102.1 R108.2 R201.2 R403.1 R603.1 S402.3 S402.4 U101.5 U102.2 U201.49 U202.2 U401.D5 U401.D7 U401.D8 U401.D9 U401.F2 U401.F6 U401.F7 U401.F8 U401.F9 U401.F10 U401.F12 U401.G2 U401.G6 U401.G7 U401.G8 U401.G9 U401.G10 U401.G12 U401.H6 U401.H7 U401.H8 U401.H9 U401.H10 U401.H12 U401.J6 U401.J7 U401.J8 U401.J9 U401.J10 U401.K6 U401.K7 U401.K8 U401.K9 U401.K10 U401.L4 U401.M1 U401.M8 U401.M9 U401.P1 U501.B3 U502.A1 U502.A3 U502.B7 U502.C3 U502.D7 U502.E3 U502.J1 U601.1 U601.TAB U701.2 U701.25 X201.2 X201.4 X401.2 X401.4
I2C1_SCL [MEM_DATA]: J302.11 U401.B6
I2C1_SDA [MEM_DATA]: J302.12 U401.B5
N$1: U201.27 U701.12
N$2: U201.25 U701.13
N$7: J702.13 R708.1 U401.A10
N$8: J702.5 R707.1 U401.A13
N$9: J702.7 R705.1 U401.A15
N$10: J702.9 R706.1 U401.A14
PB0 [MEM_DATA]: J302.13 U401.R5
PB1 [MEM_DATA]: J302.10 U401.R4
PC6 [MEM_DATA]: J301.16 U401.H15
PC7 [MEM_DATA]: J302.14 U401.G15
PC9 [MEM_DATA]: J302.8 U401.F14
PE3 [MEM_DATA]: J302.4 U401.A1
PG3 [MEM_DATA]: J302.5 U401.K15
PH10 [MEM_DATA]: J302.9 U401.L13
POWER1:N$1: R108.1 U102.5
POWER1:N$2: D101.1 U102.1
POWER1:N$3: D101.2 R103.2
QUAD_SPI_IO0 [50ohm]: U401.N14 U501.D3
QUAD_SPI_IO1 [50ohm]: U401.N13 U501.D2
QUAD_SPI_IO2 [50ohm]: U401.A2 U501.C4
QUAD_SPI_IO3 [50ohm]: U401.M15 U501.D4
RESET_L [MEM_DATA]: J301.1 R401.1 S402.1 S402.2 U401.J1
SPI2_CS_L: U201.34 U401.E14
SPI2_MISO: U201.38 U401.C14
SPI2_MOSI: U201.36 U401.C13
SPI2_SCK: U201.35 U401.D11
SPI3_CLK [MEM_DATA]: J301.11 U401.B14
SPI3_MISO [MEM_DATA]: J301.13 U401.B13
SPI3_MOSI [MEM_DATA]: J301.12 U401.A6
STM32_MCU1:BLINKY_B: R407.1 U401.N3
STM32_MCU1:BLINKY_G: R406.1 U401.N2
STM32_MCU1:BLINKY_R: R405.1 U401.P2
STM32_MCU1:BOOT: R403.2 S401.1 S401.2 U401.D6
STM32_MCU1:I2C2_SCL: U401.H4
STM32_MCU1:I2C2_SDA: U401.R13
STM32_MCU1:N$1: C401.1 U401.M10
STM32_MCU1:N$2: C402.1 U401.F13
STM32_MCU1:N$7: LED401.1 R405.2
STM32_MCU1:N$8: R402.1 U401.C6
STM32_MCU1:N$9: LED401.2 R406.2
STM32_MCU1:N$11: LED401.3 R407.2
STM32_MCU1:N$14: C425.1 R408.1 X401.3
STM32_MCU1:OSC_IN_PH0: C424.1 U401.G1 X401.1
STM32_MCU1:OSC_OUT_PH1: R408.2 U401.H1
STM32_MCU1:PC8_TIM8CH1: U401.G14
STM32_MCU1:PD5_BUT: U401.C11
UART4_RX [MEM_DATA]: J301.14 U401.D3
UART4_TX [MEM_DATA]: J301.15 U401.E12
UART5_ESP32: U201.40 U401.P13
USART1_RX [MEM_DATA]: J302.6 U401.R15 U701.21
USART1_TX [MEM_DATA]: J302.7 U401.R14 U701.20
USB_ID: R607.1 U401.D15
USB_N [USB]: R602.1 U401.C15
USB_OC: R606.1 U401.M4 U601.4
USB_OTG1:USB_ID: J601.4 R607.2
USB_OTG1:USB_N [USB]: J601.2 R602.2
USB_OTG1:USB_P [USB]: J601.3 R601.2
USB_P [USB]: R601.1 U401.B15
USB_PWR_ON: R603.2 U401.K12 U601.3

## Tracks (layer width: path | path; a pad name or v marks a point on that pad's centre or on a via)
+3V3  (via drill 0.2, 0.3)
  Top 0.102: U401.N8 27.69,33.08 v27.69,33.1 | v27.7,33.75 U401.N9 | v27.7,34.4 v27.7,34.39 U401.N10 v27.07,34.38 | 22.83,29.56 U401.F3 | U401.G3 23.48,29.53 | U401.C9 v20.56,33.73 v20.56,33.74 | U401.C8 v20.55,33.09 | U401.C7 v20.56,32.44 v20.56,32.45 | v20.55,31.14 U401.C5 | v23.81,36.32 v23.82,36.33 U401.H13 | v29.19,27.71 U401.R1 | C422.1 29.38,27.72 | U401.J13 25.08,35.72 v25.11,35.69 U401.J12
  Top 0.127: C501.1 20.71,52.81 v20.29,52.81 | U502.J9 v19.9,51.46 | U502.D3 25.3,47.46 v25.2,47.36 | U502.B3 25.35,45.48 v25.22,45.48 | U502.A7 23.04,44.55 v23.07,44.55 23.07,44.19 C505.1 | U502.C7 22.82,46.66 v23.12,46.36 | v23.29,48.17 23.16,48.05 22.79,48.05 22.78,48.06 22.73,48.06 U502.E7 | U401.K4 v25.75,29.85 v25.76,29.85 | v22.52,29.83 U401.F3 | U401.F3 | U401.J12 25.09,35.67 | 25.09,35.67 v25.11,35.69 | U401.J13 25.09,35.71 25.09,35.67
  Top 0.15: C414.1 C418.1 20.18,27.36 v20.18,27.76 | C414.1 20.88,27.36 U401.C1 | C414.1 21.38,27.34 v21.38,27.35 | R606.2 v24.89,55.99 v24.9,56 | U201.43 20.97,9.83 v20.7,10.1 | U201.46 21.36,8.7 20.91,8.7 20.84,8.63 v20.66,8.63 | R205.2 27.2,5.31 v27.2,4.7
  Top 0.152: U401.G3 v23.17,29.21 v23.17,29.2 | 20.93,45.11 U502.A9 | U502.C7 22.53,46.68 | U401.R1 28.73,28.26 v29.21,28.26 C421.1 | 29.38,27.72 v29.19,27.72 v29.19,27.71 | R401.2 17.4,16 v17.41,15.99 | C502.1 19.24,48.15 v19.24,47.9 | v21.1,6.6 21.1,7.11 21.2,7.21 21.32,7.21 | 21.32,7.21 21.45,7.21 | U201.1 21.32,7.21 | R702.2 11.07,10.52 v10.34,10.52 | R701.2 10.26,11.94 v10.21,11.99 | R704.2 11.2,18.31 v11.2,19.05
  Top 0.165: S401.4 34.59,11.42 v34.59,12.49 | S401.3 34.54,15.55 v34.54,16.49 | v23.13,20.82 | v23.13,20.82 U501.B4 | C503.1 19.25,47 v19.25,47.2 | v20.04,44.46 20.1,44.52 C504.1 20.16,45.06 U502.A9 | C507.1 29.02,47.18 v29.02,46.48 29.39,46.12 29.39,46.09 C506.1 | U401.G13 23.51,36.02 v23.82,36.33 | R707.2 v11.43,52.02 | R705.2 11.43,49.17 v11.48,49.23 | R706.2 11.43,46.56 v11.45,46.58 | R708.2 11.51,41.07 v11.51,41.73 | 6.86,64.31 U701.6 U701.5 7.38,65.47 v7.33,65.52 | U701.9 5.46,62.61 5.33,62.61 v4.98,62.26 | R703.2 10.36,7.11 v10.29,7.04
  Top 0.2: R204.1 29.97,10.67 v30,10.7 | U201.19 27.08,9.48 v27.1,9.5 | v21.88,12.92 21.95,12.84 U201.37 | R202.1 25.65,15.75 v25.6,15.8 | LED401.4 32.35,7.15 v32.3,7.2
  Top 0.203: C704.1 5.97,64.14 v6.1,64.26 | U701.7 6.19,64.17 v6.1,64.26 | C701.1 v6.1,65.02 | 6.86,64.31 U701.6 6.86,64.31 | 6.86,64.31 6.15,65.02 v6.1,65.02 | 6.86,64.31 C703.1 6.48,65.41 v6.1,65.02 | v6.1,64.26 v6.1,65.02
  Top 0.406: v19.1,62.6 19.05,62.65 U101.3 19.1,63.78
  Bottom 0.1: C411.1 22.83,30.15 v22.52,29.83 22.52,29.93 C412.1 | 25.76,29.87 25.79,29.84 25.79,29.99 C420.1 | 25.76,29.87 25.76,29.92 C419.1 | 25.76,29.87 v25.76,29.85
  Bottom 0.102: C407.1 27.7,33.71 v27.7,33.75 | C403.1 27.63,33.1 v27.69,33.1 | C415.1 26.78,34.67 v27.07,34.38 | C416.1 20.73,30.97 v20.55,31.14 | C410.1 U401.C7 v20.56,32.45 | C409.1 U401.C8 v20.55,33.09 | C408.1 20.9,33.4 v20.56,33.74 20.66,33.74 C413.1 | C406.1 25,35.69 v25.11,35.69 24.77,35.6 C417.1 | C404.1 23.81,36.25 v23.81,36.32
  Bottom 0.15: C101.1 18.22,62.12 v18.1,62 | C102.1 20.18,62.12 v20.3,62 | C212.1 20.89,9.91 v20.7,10.1 | C214.1 20.92,8.89 v20.66,8.63 | v21.1,6.6 21.1,6.88 C209.1 | L202.2 C208.1 C207.1 v25.4,6.4 | L202.2 23.8,5.82 v23.8,5.2 | L202.2 23.1,5.12 v23.1,5.1
  Bottom 0.152: R402.2 21.68,31.52 v21.93,31.76
  Bottom 0.165: C508.1 v23.13,20.81 v23.13,20.82 | C405.1 23.81,36.24 v23.81,36.32
  Bottom 0.2: C217.1 26.82,9.5 v27.1,9.5 26.26,9.5 C213.1 | C210.1 22.1,12.7 v21.88,12.92
  pour Route14 (rank 3): -0.15,73.91 -0.15,0 38.1,0 38.1,73.91
  cutout Route14: 26.95,4.27 26.95,2.11 27.79,2.11 27.79,0.18 30.15,0.18 30.15,2.11 30.96,2.11 30.96,4.27
+5V  (via drill 0.2, 0.3)
  Top 0.15: R101.2 21.51,65.2 v20.9,65.2 | Q101.2 24.1,59.35
  Top 0.2: C109.1 16.67,64.77 | C112.1 16.24,64 v16.5,64
  Top 0.254: v12.19,67.82 11.9,67.53 D701.1 | D701.1 11.9,66.59 v12.19,66.29 | D701.1 12.98,67.03 v13.21,66.8
  Top 0.305: v13.5,65.4 13.53,65.43 D601.1 13.53,65.83 v14.3,66.6 | v15.1,67.8 15.73,67.8 C601.1 15.87,67.69 U601.2 | 16.67,64.77 v16.7,64.8 | U101.4 17.5,63.78 v17.5,65 | 24.1,59.35 24.1,57.6 25.3,56.4 30.5,56.4 31.3,57.2 v33.9,57.2
  Top 0.406: v16.7,64.8 16.7,64.58 U101.4 17.28,64 v16.5,64
  Route3 0.15: v20.9,65.2 17.7,65.2 v17.5,65
  pour Route14 (rank 2): 11.18,68.2 11.18,62.8 17.9,62.8 17.9,64.2 32.9,64.2 32.9,44.6 38.04,44.6 38.04,73.6 31.5,73.6 31.5,65.6 20.3,65.6 20.3,68.2
+VBAT  (via drill 0.2, 0.3)
  Top 0.254: 34.55,67.06 C104.1
  Top 0.305: 27.77,59.67 P101.2
  Top 0.406: U102.3 v33.4,67.75 33.86,67.75 34.55,67.06 | C104.1 33.42,66.94 v33.4,66.93
  Route3 0.406: J302.1 34.29,55.03 v30.05,59.27 30.05,60.76 v30.04,60.78 30.68,60.78 33.4,63.5 v33.4,66.93 v33.4,67.75
  pour Top: 24.7,61 24.7,58.8 30.3,58.8 30.3,61.2 24.7,61.2
+VBUS  (via drill 0.2, 0.3)
  Top 0.127: v22.2,38.15 21.39,38.96 21.39,39.52 | 21.39,39.52 21.39,39.54 | 21.39,39.52 18.48,42.42 16.4,42.42 16.01,42.81 16.01,43.34 v16.52,43.86
  Top 0.15: U401.E15 22.2,37.34 v22.2,38.15 | C620.1 25.14,65.79 v25.14,66.29
  Top 0.2: Q101.1 | Q101.1 24.13,60 R102.2 | v23.7,60 24.13,60 Q101.1
  Top 0.254: U601.5 U601.6 19.33,68.76 v19.33,68.79 | v29.21,68.83 U102.4 27.62,67.75 v27.56,67.69 27.32,67.45 27.32,66.8 | 27.32,66.8 C103.1 27.8,66.69 28.32,66.17 28.32,65.02 29.84,63.5 R103.1 | 27.32,66.8 v26.42,66.8 | D601.2 13.53,68.89 v13.46,68.96
  Top 0.305: J601.1 25.44,69.5 v25.44,68.09 | J601.1 25.43,68.86 v26.19,68.1 | J601.1 v25.43,70.69 | D601.2 13.52,67.94 | 30.03,63.58 R103.1
  Route3 0.127: v16.61,53.49 18.14,55.02 20.83,55.02 22.19,56.38 22.19,56.59 22.19,57.33 23.7,58.84 v23.7,60
  Bottom 0.127: v16.52,43.86 16.52,53.41 v16.61,53.49
  Bottom 0.2: v25.14,66.29 24.7,65.86 24.7,61 v23.7,60
  pour Route14: 12.65,73.66 12.65,68.13 20.32,68.13 20.32,65.53 31.5,65.53 31.5,73.66
+VREF  (via drill 0.2)
  Top 0.102: v27.42,27.65 27.42,28.18 U401.N1
  Top 0.127: v15.79,22.57 18.3,22.57 18.49,22.39 26.29,22.39 v27.38,23.48 | v16.26,56.1 16.17,56.01 J301.3
  Bottom 0.102: C423.1 27.38,27.61 v27.42,27.65
  Bottom 0.127: C423.1 27.59,26.83 27.62,26.83 27.72,26.73 27.81,26.73 27.81,23.91 v27.38,23.48 | v16.26,56.1 16.09,55.93 16.09,45.67 16.11,45.66 16.11,44.65 16.09,44.63 16.09,40.24 16.14,40.19 16.14,38.16 15.66,37.67 | 15.38,32.13 15.38,30.88 15.34,30.84 15.34,30.2 15.92,29.62 15.92,28.96 | v15.79,22.57 15.79,23.79 15.92,23.92 15.92,28.96 | 15.92,28.96
  Bottom 0.152: 15.66,37.67 15.66,32.41 15.38,32.13
ADC1_IN3  (via drill 0.2)
  Top 0.152: U401.R2 30.34,28.87 30.57,28.63 31.13,28.63 31.35,28.41 31.35,28.12 v32.19,27.28
  Route3 0.127: 15.43,40.85 15.43,44.39 J301.7
  Route3 0.152: 15.43,33.76 15.43,30.98 15.31,30.86 15.31,27.19 19.67,22.82
  Route3 0.165: 19.67,22.82 20.09,22.82 20.44,22.47 21,22.47 21.35,22.82 27.73,22.82 v32.19,27.28 | 15.43,40.85 15.77,40.51 15.85,40.51 16.16,40.19 16.16,39.75 15.85,39.44 15.85,38.94 15.43,38.52 15.43,36.58 15.43,33.76
ADC1_IN7  (via drill 0.2)
  Top 0.127: U401.R3 30.36,29.52
  Top 0.152: 30.36,29.52 30.4,29.56 30.75,29.56 31.51,28.8 31.51,28.73 31.88,28.36 31.94,28.36 v32.56,27.75
  Route3 0.127: J301.8 15.1,42.17 15.1,39.69 14.79,39.38 14.79,38.95 14.88,38.86 14.88,32.51 14.88,27.27 19.7,22.45
  Route3 0.152: 19.7,22.45 20.22,21.93 21.83,21.93 22.26,22.36
  Route3 0.165: v32.56,27.75 32.56,27.45 32.58,27.44 32.58,27.12 27.82,22.36 22.26,22.36
ADC1_IN10  (via drill 0.2)
  Top 0.127: 26.38,27.96 26.38,28.07 26.39,28.09 26.39,28.53 U401.M2
  Top 0.152: v26.32,26.67 26.32,27.48 26.32,27.49 26.32,27.8 26.38,27.86 26.38,27.96
  Top 0.165: 16.85,16.88 15.91,16.88 | 16.85,16.88 14.75,16.88 v14.66,16.8 | v26.66,16.09 25.85,16.09 25.07,16.88 16.85,16.88
  Bottom 0.127: 15.15,31.33 15.15,30.97 | 15.15,30.97 15.12,30.93 | 15.12,30.93 15.12,29.97 | 15.15,30.97 15.12,30.93 | 15.12,30.93 15.12,29.97 | 15.12,29.97 15.7,29.39 15.7,24.01 15.38,23.69 15.38,22.02 15.36,22 15.36,20.75 15.52,20.59 | 15.15,33.27 15.15,32.24 15.14,32.23 15.14,32.03 15.15,32.02 15.15,30.97 | 15.15,30.97
  Bottom 0.152: 26.66,23.4 26.66,23.41 26.66,24.27 26.74,24.35 26.74,24.67 26.66,24.75 26.66,26.33 | 14.82,38.7 15.15,38.36 15.15,33.27
  Bottom 0.165: 26.66,23.4 v26.66,16.09 | J301.9 13.97,39.55 14.82,38.7 | v14.66,16.8 14.66,16.97 15.52,17.83 15.52,20.59 | v26.32,26.67 26.66,26.33
ADC1_IN11  (via drill 0.2)
  Top 0.127: v26.41,29.84 U401.M3
  Top 0.152: v23.17,21.91 15.01,21.91 v14.97,21.94
  Bottom 0.127: J301.10 13.97,37.34 | 14.88,31.41 14.88,31.5 | 14.88,31.5 14.88,31.63 14.88,31.5 | 14.88,29.05 14.88,29 | 14.88,29.05 14.88,30.8 | 14.88,30.8 14.88,31.21 | 14.88,29.05 14.88,28.82 15.15,28.55 15.15,27.58 14.88,27.31 14.88,26.28 15.15,26.02 15.15,24.5 15.15,22.11 v14.97,21.94 | 14.88,31.5 14.88,30.8
  Bottom 0.152: v26.41,29.84 26.41,27.89 26.32,27.8 26.32,27.2 25.94,26.83 25.94,25.58 23.17,22.81 v23.17,21.91 | 13.97,37.34 12.95,36.32 12.95,32.77 14.19,31.53 14.35,31.53 14.39,31.5 14.88,31.5
CAN1_RX  (via drill 0.2)
  Top 0.127: U401.A5 18.62,30.82
  Top 0.165: v16.58,31.42 17.25,31.42 17.59,31.08 18.35,31.08 18.62,30.82 | v17.09,20.3 16.94,20.45 J301.17
  Bottom 0.127: v17.1,20.31 17.1,22.89 17.09,22.89 17.09,23.2 17.1,23.21 17.1,27.29 17.03,27.36 17.03,29.56 16.91,29.68 16.91,30.27 16.58,30.6 v16.58,31.42
  Bottom 0.165: v17.1,20.31 v17.09,20.3
CAN1_TX  (via drill 0.2)
  Top 0.127: U401.B4 20.2,30.17 19.9,29.87 19.72,29.87 19.71,29.85 19.45,29.85 19.44,29.87 18.86,29.87
  Top 0.152: 17.6,29.26 17.94,29.6 18.27,29.6 18.54,29.87 18.86,29.87
  Top 0.165: v14.08,29.31 14.14,29.26 17.6,29.26
  Bottom 0.127: J301.18 12.99,18.89 12.99,23.32 14.28,24.61 14.35,24.61 14.85,25.11 14.9,25.11
  Bottom 0.165: v14.08,29.31 14.64,28.76 14.64,28.72 14.9,28.45 14.9,27.68 14.64,27.42 14.64,26.18 14.9,25.91 14.9,25.11
DAC_OUT1  (via drill 0.2)
  Top 0.127: J301.5 15.97,50.93 17.18,52.14 | v32.09,48.78 28,52.86 24.13,52.86 | U401.N4 v27.7,29.84 v27.71,29.84
  Top 0.152: 17.18,52.14 21,52.14 21.71,52.85 22.42,52.85 22.43,52.86 24.13,52.86
  Route3 0.152: v32.14,29 31.29,29 30.72,29.56 27.99,29.56 v27.71,29.84
  Bottom 0.127: 32.48,37.18 32.83,36.83 32.83,36.75 32.83,36.67 32.83,36.25 32.91,36.17 32.91,35.86 32.79,35.74 32.79,32.15
  Bottom 0.152: v32.09,48.78 32.09,37.57 32.48,37.18 | 32.79,32.15 32.71,32.08 32.71,31 31.79,30.07 31.79,29.48 32.14,29.13 v32.14,29
DAC_OUT2  (via drill 0.2)
  Top 0.127: 32.21,28.62 32.71,28.11 32.72,28.11 33.03,27.8 33.03,27.44 | U401.P4 28.35,29.85 30.06,29.85
  Top 0.15: 29.95,29.85 30.06,29.85 31.48,29.85 31.79,29.54 31.79,29.18 31.76,29.15 31.76,28.84 31.98,28.62 32.21,28.62 | 33.03,27.44 v33.03,27.4
  Route3 0.152: 12.96,46.52 12.83,46.38 12.83,25.38 12.96,25.25
  Route3 0.165: J301.6 13.97,47.53 12.96,46.52 | 12.96,25.25 14.34,23.87 17.35,23.87 18.25,22.97 18.25,22.59 19.38,21.47 27.86,21.47 28.65,22.26 31.73,22.26 32.94,23.46 32.94,27.31 v33.03,27.4
DEBUG1:+VBUS_UART  (via drill 0.2)
  Top 0.152: v9.85,65.05 9.85,65.81 9.87,65.83
  Top 0.165: U701.8 4.97,63.11 v4.88,63.02
  Top 0.406: J701.1 9.68,67.17 D701.2 9.54,66.16 9.87,65.83 C720.1
  Bottom 0.152: v4.88,63.02 5.33,63.48 8.74,63.48 9.85,64.59 v9.85,65.05
DEBUG1:D_N
  Top 0.165: 7.87,64.26 U701.4 7.88,65.24 7.92,65.28 7.92,68.58 7.73,68.77 J701.4
DEBUG1:D_P
  Top 0.165: U701.3 8.37,64.29 8.35,64.27 8.35,65.27 8.34,65.28 8.34,69.54 J701.3
EN_3V3  (via drill 0.2)
  Top 0.15: R101.1 22.1,63.76
  Top 0.165: v21.87,62.09 21.87,63.52 U101.1 | J302.2 29.45,53.23 v22.26,53.23
  Top 0.305: 22.1,63.76 U101.1
  Bottom 0.165: v21.87,62.09 22.26,61.69 22.26,59.3 22.17,59.2 22.17,56.23 22.26,56.14 v22.26,53.23
ESP32:40MHZ_N
  Top 0.1: X201.3 18.32,10.51
  Top 0.15: U201.44 20.62,9.48 20.19,9.91 20.1,10
  Top 0.152: C204.1 18.35,10.79 arc-90 X201.3 19.47,10.63 20.1,10
ESP32:40MHZ_P
  Top 0.1: 20.3,9.2 20.11,9.2 R208.1 20.07,9.13
  Top 0.15: 20.07,9.13 U201.45
ESP32:CHIP_ANT_50OHM
  Top 0.15: 22.76,2.14 22.81,2.14 22.23,2.14 C205.1 arc90 22.21,2.03
  Top 0.152: 22.23,2.14 21.4,2.14 C220.1 | C205.1 23.18,2.14 arc-90 L201.2
ESP32:EXTANT_50OHM
  Top 0.152: 15.5,5.94 ANT202.SIG 15.64,5.46 15.98,5.46 arc-90 C219.1
ESP32:GPIO26  (via drill 0.2)
  Top 0.152: v18.92,4.83 19.35,4.83 19.53,4.64
  Top 0.165: U201.15 26.56,8.08 v27.05,7.57 | 19.53,4.64 U202.6
  Route3 0.152: 20.17,6.11 19.19,6.11 18.92,5.84 18.92,5.56 18.92,5.24 v18.92,4.83
  Route3 0.165: v27.05,7.57 26.75,7.26 20.95,7.26 20.69,7 20.69,6.63 20.17,6.11
ESP32:GPIO27  (via drill 0.2)
  Top 0.152: v22.05,4.7 20.91,4.7 arc90 U202.4 | U201.16 27.13,8.43 28.27,7.29 v28.27,7.09
  Top 0.165: 21.98,4.63 arc90 v22.05,4.7
  Route3 0.165: v28.27,7.09 27.2,7.09 25.65,5.54 24.01,5.54 23.96,5.59 22.94,5.59 v22.05,4.7
ESP32:LNA_50OHM
  Top 0.165: C221.2 arc90 21.95,6.77 U201.2
ESP32:N$1
  Top 0.1: U201.48 21.43,7.89 21.3,7.75 21.11,7.75 20.99,7.87 C211.2
ESP32:N$2
  Top 0.15: U201.47 20.99,8.43 20.81,8.25 20,8.25 19.47,7.71 C201.2 18.96,7.37 R201.1
ESP32:N$3
  Top 0.15: C203.2 24.18,6.04 24.18,6.09 24.05,6.22 U201.8
ESP32:N$4
  Top 0.152: U201.5 arc90 22.99,7.19 22.99,5.96 arc-90 C202.1
ESP32:N$5
  Top 0.15: C202.2 23.36,7.19 U201.6
ESP32:N$6
  Top 0.152: C224.1 16.21,9.93 X201.1 17.98,9.14 R208.2
ESP32:N$7
  Top 0.15: U201.7 23.7,6.02 C203.1
ESP32:N$8
  Top 0.15: L201.1 arc90 24.34,1.89
  Top 0.152: C206.1 25.27,1.89 | 25.27,1.89 26.27,1.89 arc-90 ANT201.1 | L201.1 25.13,2.03 arc-90 25.27,1.89
ESP32:N$10
  Top 0.152: R203.1 19.72,13.3 19.72,10.91 20.1,10.53 U201.41
ESP32:N$11  (via drill 0.2)
  Top 0.203: U201.3 U201.4 arc90 22.48,7.04 22.48,6.48 v22.48,6.37 arc90 22.43,6.32 v22.43,5.8
  Top 0.254: U201.4 arc90 22.48,7.04 22.48,6.48 | 22.48,6.48 v22.48,6.37 | v22.48,6.37 22.48,6.48 | v22.43,5.8 arc90 22.48,5.85 v22.48,6.37
  Bottom 0.2: 22.88,5.88 22.48,6.28 v22.48,6.37 22.48,6.74 C215.1 | 22.88,5.88 L202.1 | v22.43,5.8 22.8,5.8 22.88,5.88
ESP32:N$13
  Top 0.152: U202.3 20.84,2.2 arc90 C220.2
  Top 0.165: U202.3 arc-90 20.86,2.92
ESP32:N$14
  Top 0.152: C219.2 19.53,2.92 arc90 U202.1
  Top 0.165: C219.2 arc-90 19.03,2.94
ESP32:N$15
  Top 0.152: C221.1 U202.5 arc-90 U202.5
  Top 0.165: C221.1 arc-90 C221.1
ESP32:N$17
  Top 0.2: U201.26 25.8,13.1 C216.1 25.91,13.72 R202.2
ESP32_BOOT_L  (via drill 0.2)
  Top 0.102: U401.E3 v21.87,29.2 v21.86,29.2
  Top 0.2: U201.22 v27.33,10.53 28.81,10.53 R204.2
  Bottom 0.152: 22.47,27.51 22.47,28.03 22.12,28.38 22.12,28.95 v21.86,29.2
  Bottom 0.165: 22.47,27.51 22.47,16.11 23.55,15.04 23.64,15.04 27.33,11.35 v27.33,10.53
ESP32_MTCH  (via drill 0.2)
  Top 0.152: U201.20 26.89,9.83 26.94,9.88 27.46,9.88 v28.45,8.89 | v11.73,9.47 11.73,12.29 11.58,12.45 R701.1 7.7,15.93 J703.9
  Route3 0.152: v28.45,8.89 27.39,8.89 27.26,8.77 25.36,8.77 25.11,8.52 21.3,8.52 20.81,9.01 20.5,9.01 20.38,8.89 12.5,8.89 12.32,8.89 v11.73,9.47
ESP32_MTDI  (via drill 0.2)
  Top 0.152: U201.18 26.93,9.13 26.94,9.12 27.26,9.12 27.27,9.13 27.47,9.13 27.79,8.81 | 27.79,8.81 27.79,8.76 | 27.79,8.81 28.14,8.46 28.35,8.46 29.26,7.55 v29.26,6.88 | 10.56,7.62 v10.54,7.64 10.56,7.62 | 10.56,7.62 R703.1
  Route3 0.152: v29.26,6.88 29.26,5.92 28.57,5.23 26.29,5.23 25.78,4.72 25.78,4.64 25.08,3.94 23.72,3.94 22.75,2.97 18.69,2.97 16.18,0.46 12.75,0.46 10.67,2.54 10.67,7.52 v10.54,7.64
  Bottom 0.152: v10.54,7.64 10.54,8.87 J703.5
ESP32_MTDO  (via drill 0.2)
  Top 0.152: U201.21 26.35,10.15 27.49,10.15 27.5,10.16 27.69,10.16 28.02,9.83 28.02,9.74 28.36,9.4 v28.7,9.4 | v12.19,10.08 12.19,16.76 R704.1 10.69,17.78 10.16,18.31 10.16,19.41 J703.13
  Route3 0.152: v28.7,9.4 27.54,9.4 27.26,9.12 25.36,9.12 25.26,9.02 24.94,9.02 24.56,9.4 12.19,9.4 v12.19,10.08
ESP32_MTMS  (via drill 0.2)
  Top 0.152: U201.17 26.39,8.7 27.21,8.7 27.84,8.08 v28.19,8.08 | J703.7 9.5,12.45 9.5,10.41 10.01,9.9 R702.1 v11.18,8.64
  Route3 0.152: v11.18,8.64 15.49,8.64 16.51,7.62 25.4,7.62 25.86,8.08 v28.19,8.08
ESP32_RESET_L  (via drill 0.2)
  Top 0.102: U401.K1
  Top 0.15: U201.9 24.4,6.7 25.26,5.84 C218.1 R205.1 27.18,6.4 v27.2,6.42 | v26.36,24.51 26.38,24.53 26.38,25.36 25.53,26.21 25.53,26.94 25.37,27.09 25.37,27.41 25.43,27.46 U401.K1
  Bottom 0.15: 27.7,14.02 27.71,14.01 27.71,6.93 v27.2,6.42
  Bottom 0.152: v26.36,24.51 26.36,16.34 26.27,16.25 26.27,15.45 27.7,14.02 | v27.2,6.42 27.2,6.06 25.08,3.94 23.72,3.94 22.73,2.95 19.61,2.95 17.42,5.13 15.04,5.13 13.64,6.53 10.41,6.53 | 10.41,6.53 10.31,6.53 | J703.3 9.91,6.96 9.91,6.88 10.26,6.53 10.41,6.53
ESP32_UART5  (via drill 0.2)
  Top 0.102: 21.19,36.97 21.19,37.68 21.15,37.73
  Top 0.127: 21.19,35.77 21.19,36.97 21.2,36.98 21.19,36.97
  Top 0.15: 21.09,38.93 21.09,37.78 21.15,37.73
  Top 0.152: R203.2 v19.05,15.07 | v16.97,41.69 18.33,41.69 21.09,38.93
  Top 0.165: U401.D12 21.19,35.7 21.19,35.77
  Bottom 0.127: 16.51,21.86 16.51,17.61 | 16.57,35.44 16.57,31.93 | v16.97,41.69 16.97,36.59 16.51,36.14
  Bottom 0.152: 16.51,17.61 v19.05,15.07
  Bottom 0.165: 16.51,36.14 16.51,35.5 16.57,35.44 | 16.57,31.93 16.45,31.81 16.42,31.81 16.2,31.58 16.2,31.26 16.34,31.12 16.34,30.5 16.66,30.17 16.66,29.38 16.75,29.29 16.75,22.1 16.51,21.86
FLASH_CLK  (via drill 0.2)
  Top 0.1: U401.M6 v27.06,31.14 v27.05,31.14
  Top 0.152: v28.56,20.63 27.65,20.63 26.8,19.77 23.94,19.77 23.59,19.42 23.59,18.73 23.17,18.3 U501.B2
  Bottom 0.1: v27.05,31.14 27.05,31.08
  Bottom 0.152: v27.05,31.14 28.19,30 28.19,28.75 | 28.19,28.75 28.19,28.29 | 28.19,28.29 28.27,28.2 | 28.27,28.2 28.5,27.98 | 28.5,27.98 28.6,27.88 28.6,20.67 v28.56,20.63 | 28.27,28.2 28.2,28.28 | 28.19,28.75 28.19,28.29 | 28.19,28.29 28.5,27.98
FLASH_CS_L  (via drill 0.2)
  Top 0.15: U401.R12 29.39,35.37
  Top 0.165: 29.39,35.37 29.77,35.74 v29.77,35.77 | v32.51,16.81 32.47,16.77 25.95,16.77 25.53,17.19 25.53,17.64 25.35,17.82 24.61,17.82 U501.C2
  Bottom 0.152: 31.7,21.33 32.51,20.52
  Bottom 0.165: 32.51,20.52 v32.51,16.81 | 31.7,21.33 31.7,28.45 31.21,28.94 31.21,29.45 31.11,29.56 31.11,29.8 30.15,30.76 30.15,31.62 29.79,31.98 29.79,35.74 v29.77,35.77
FMC_A0  (via drill 0.2)
  Top 0.15: v21.9,27.38 21.9,28.03 21.85,28.08 21.85,28.54 U401.E2
  Top 0.152: v23.28,50.65 22.54,50.65 U502.H7
  Route3 0.165: v23.28,50.65 22.76,50.12 21.77,50.12 21.24,49.6 18.61,49.6 18.01,48.99 18.01,46.51 17.8,46.3 17.8,45.98 18.01,45.77 18.01,44.76 18.24,44.53 18.24,44.28 18.76,43.76 18.76,37.34 17.58,36.16 17.58,32.34 21.9,28.02 v21.9,27.38
FMC_A1  (via drill 0.2)
  Top 0.102: U401.H3 v24.45,29.2 v24.46,29.2
  Top 0.152: U502.H8 21.35,50.28 v21.35,50.25
  Route3 0.165: v21.35,50.25 20.93,50.67 20.22,50.67 19.99,50.9 17.75,50.9 17.21,50.37 17.21,44.69 17.69,44.22 17.69,44.03 18.02,43.7 18.02,38.8 16.93,37.71 16.93,31.99 17.23,31.69 17.23,31.65 18.88,30 18.88,26.45 19.48,25.86 21.11,25.86 21.14,25.9 21.9,25.9 21.93,25.86 23.63,25.86 24.1,26.33 24.1,26.99 24.46,27.35 v24.46,29.2
FMC_A2  (via drill 0.2)
  Top 0.127: 24.24,28.75 24.44,28.55 24.44,27.21 24.5,27.15
  Top 0.152: U502.J8 v21.3,51.89 v21.3,51.9 | v24.74,25.6 24.5,25.84 24.5,27.15 | 24.24,28.75 U401.H2
  Route3 0.165: v21.3,51.9 17.55,51.9 16.9,51.25 16.9,44.63 17.42,44.11 17.42,43.78 17.39,43.76 17.39,39.37 16.62,38.6 16.62,31.93 16.97,31.58 16.97,31.42 17.26,31.13 17.26,27.2 19.46,25 19.78,25 20.17,25.38 20.4,25.38 20.43,25.41 24.54,25.41 v24.74,25.6
FMC_A3  (via drill 0.2)
  Top 0.127: U401.J2 24.78,28.66 25.09,28.35 25.09,28.03 25.15,27.98 25.15,27.52 25.13,27.5 25.13,27 25.15,26.98 v25.15,26.49
  Top 0.152: v23.15,51.95 22.66,51.46 U502.J7
  Route3 0.165: v23.15,51.95 22.75,52.35 17.15,52.35 16.12,51.32 16.12,45.98 16.3,45.8 16.3,44.18 16.13,44.01 16.13,42.85 16.3,42.67 16.3,41.67 17.07,40.9 17.07,39.79 16.37,39.09 16.37,38.73 16.19,38.55 16.19,31.2 16.81,30.59 16.81,27 18.69,25.12 18.97,25.12 19.35,24.73 21.16,24.73 21.37,24.52 24.23,24.52 25.15,25.43 v25.15,26.49
FMC_A4  (via drill 0.2)
  Top 0.127: U401.J3 v25.11,29.19
  Top 0.152: v25.75,52.35 25.73,52.33 U502.J3
  Route3 0.152: v25.11,29.19 25.11,27.47 25.11,27.32 | 25.67,25.9 26.85,24.72 28.92,24.72 33.05,28.85 | v25.75,52.35 26.4,53 28.88,53
  Route3 0.165: 28.88,53 32.81,49.08 32.81,43.76 33.35,43.22 33.35,33.41 | 33.35,33.41 33.35,33.3 | 33.35,33.41 33.35,29.15 33.05,28.85 | 25.11,27.47 25.11,27.08 25.6,26.59 25.6,25.98 25.67,25.9
FMC_A5  (via drill 0.2)
  Top 0.127: U401.K3 25.43,29.38 25.75,29.06 v25.75,27.25
  Top 0.152: U502.J2 26.53,51.53 v26.95,51.95
  Route3 0.165: v26.95,51.95 27.31,52.31 27.95,52.31 28.05,52.22 29.19,52.22 31.5,49.91 31.5,44.49 32.32,43.67 32.32,41.01 32.9,40.43 32.9,36.19 32.92,36.17 32.92,35.85 32.9,35.83 32.9,31.99 32.71,31.8 32.71,29.01 32.3,28.61 31.16,28.61 31.13,28.64 30.81,28.64 30.58,28.41 30.58,28.09 28.34,25.85 27.74,25.85 27.54,25.64 27.21,25.64 27,25.85 26.48,25.85 25.86,26.46 25.86,27.14 v25.75,27.25
FMC_A6  (via drill 0.2)
  Top 0.127: U401.P6 28.37,31.13 28.81,31.13 28.92,31.02 31.46,31.02 31.7,31.26 v32.29,31.26
  Top 0.152: U502.H3 25.59,50.66 v25.19,51.05
  Route3 0.152: v32.29,31.26 32.29,31.38
  Route3 0.165: 32.38,31.47 32.38,32 32.46,32.09 32.46,33.23 31.96,33.73 31.96,40.01 30.44,41.53 30.44,44.19 31.22,44.97 31.22,49.79 29.53,51.48 25.62,51.48 v25.19,51.05